# Altium PCB LED_Control.PcbDoc (part 1 of 3)
Units mil, origin at the board's own origin, x right, y up, seen from the top; angles counter-clockwise.
Board outline 2900 x 5000 mil, 4 copper layers (Top Layer, GND1, GND2, Bottom Layer), stack 51.864 mil thick; 163 components, 141 nets, 650 pads, 368 vias.
Unrouted connection lines stored in the file: 67.
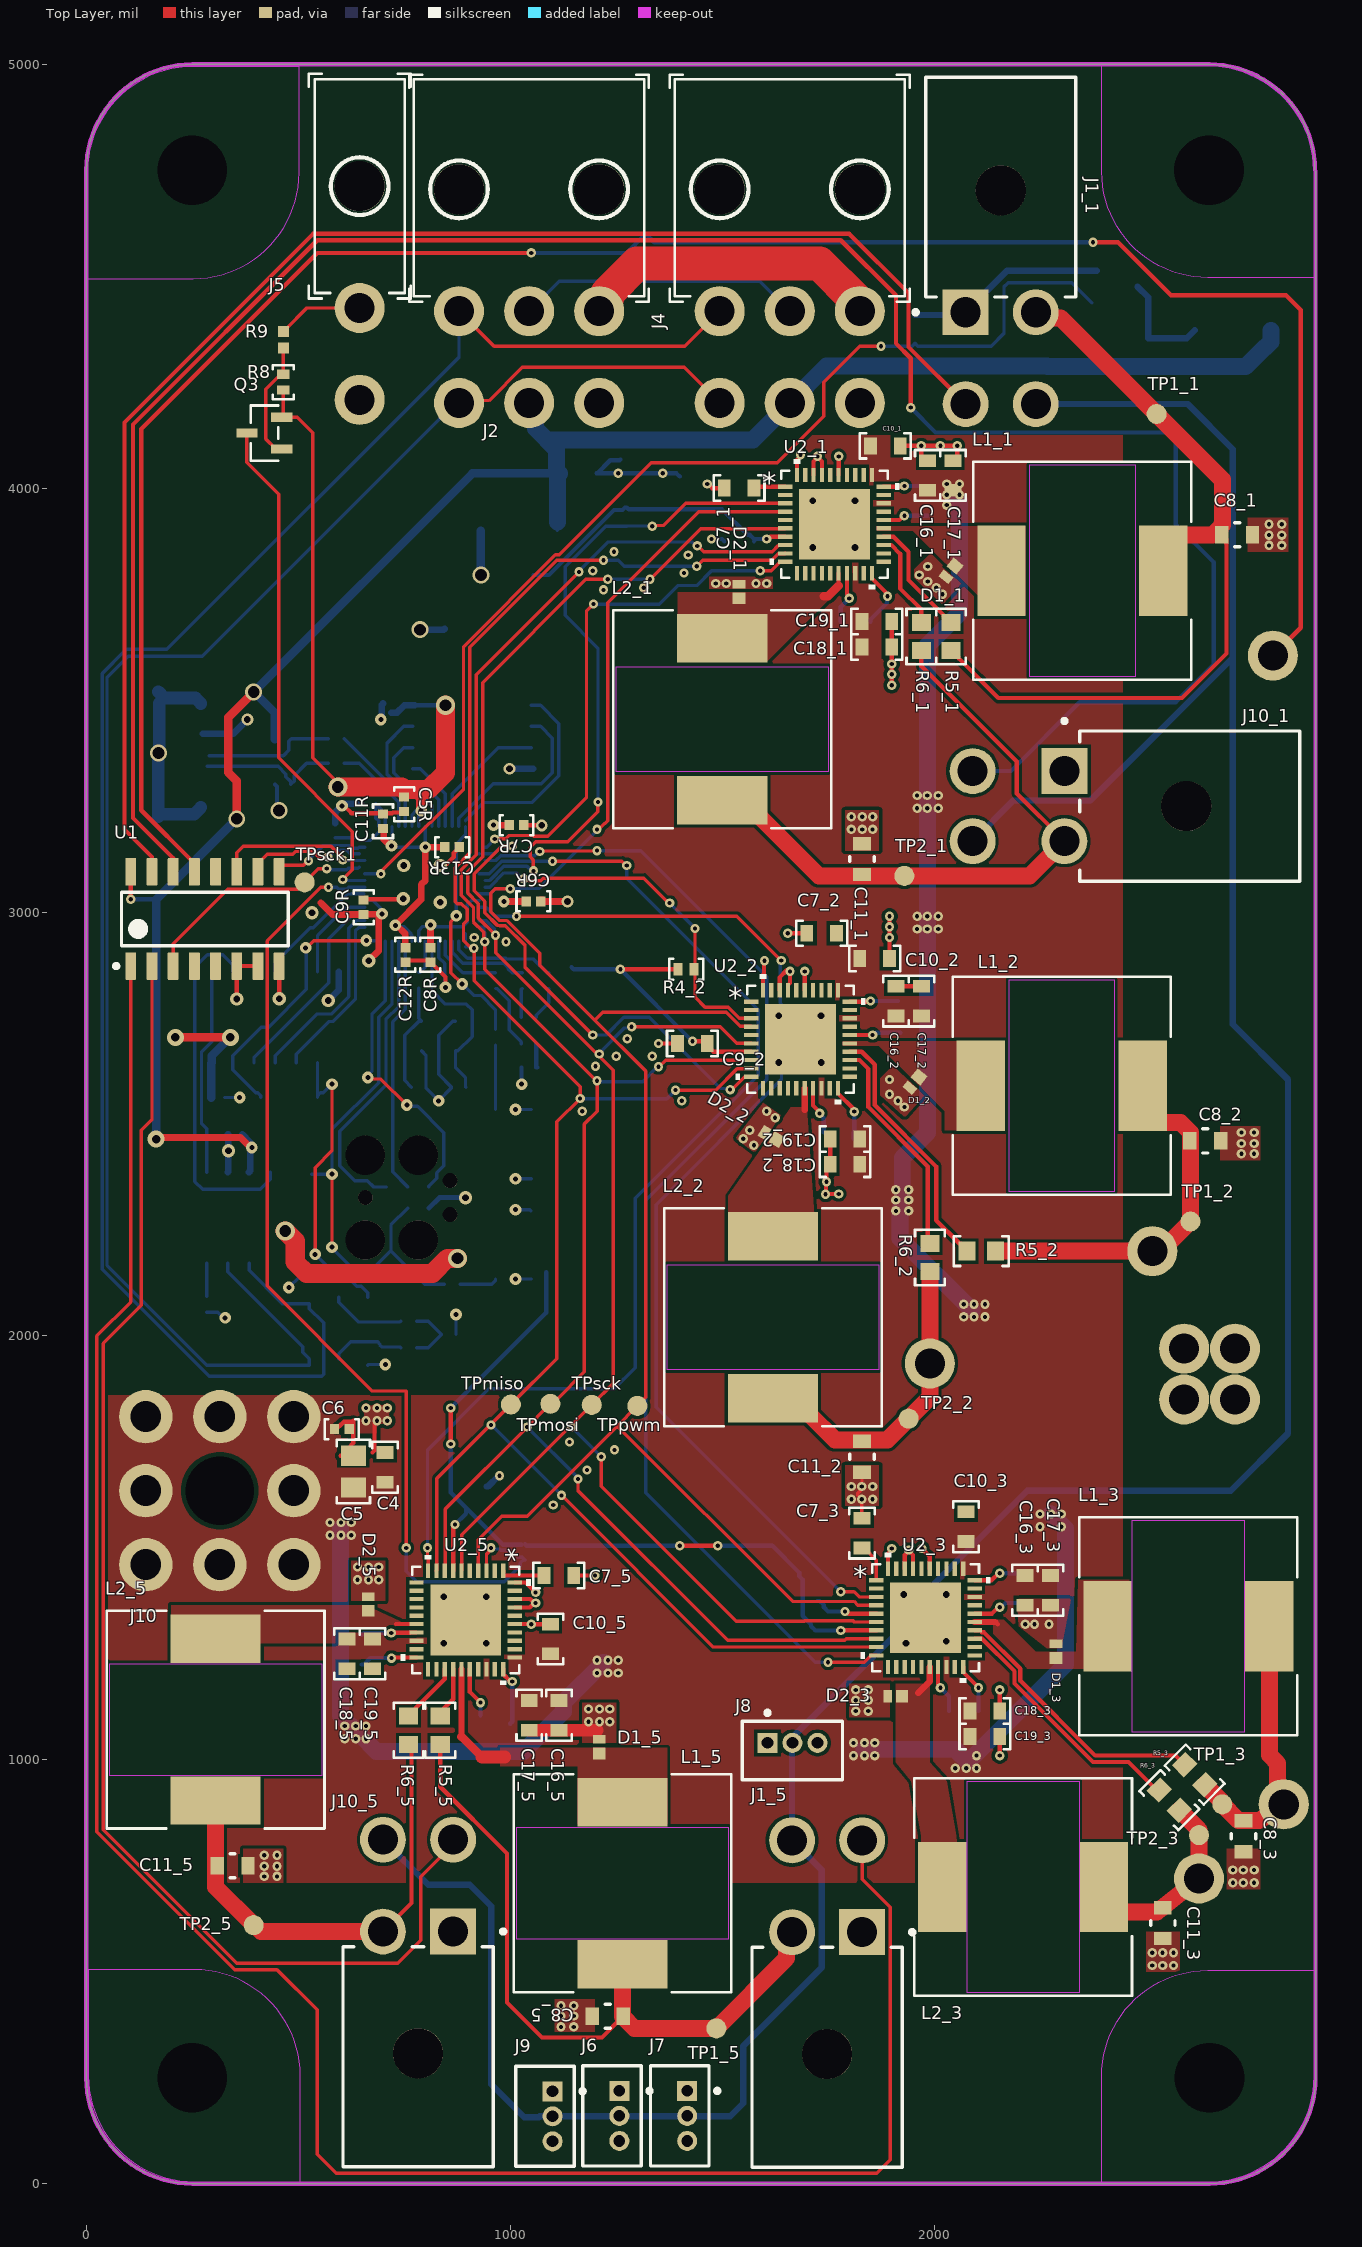
[diagram p0: Top Layer view]
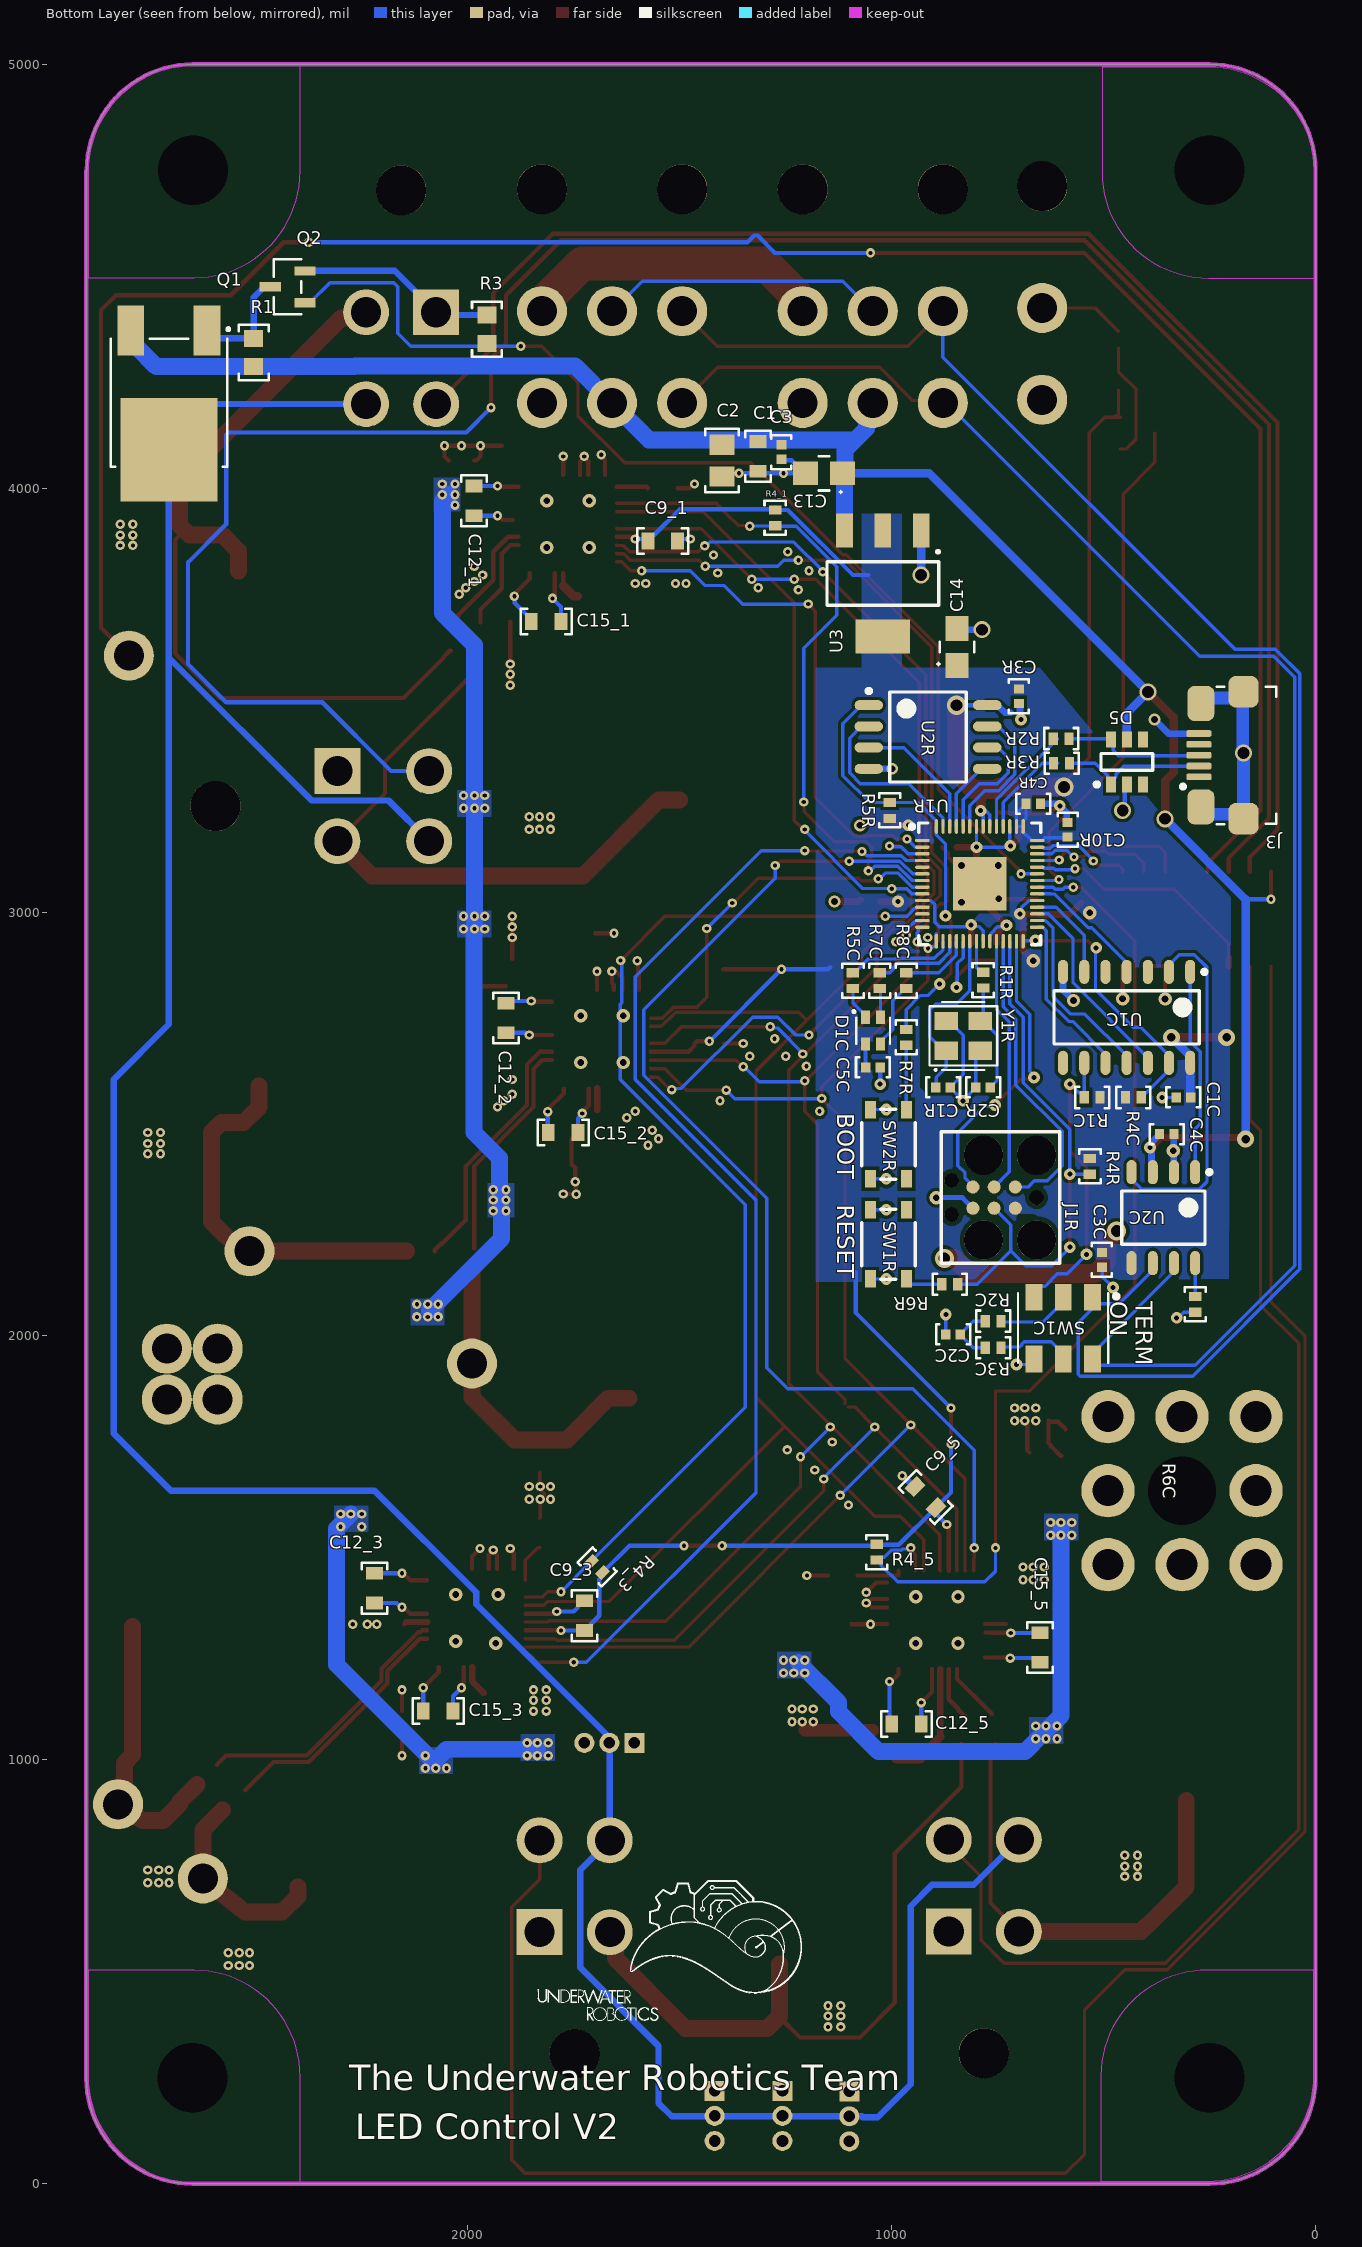
[diagram p1: Bottom Layer view, seen from below]
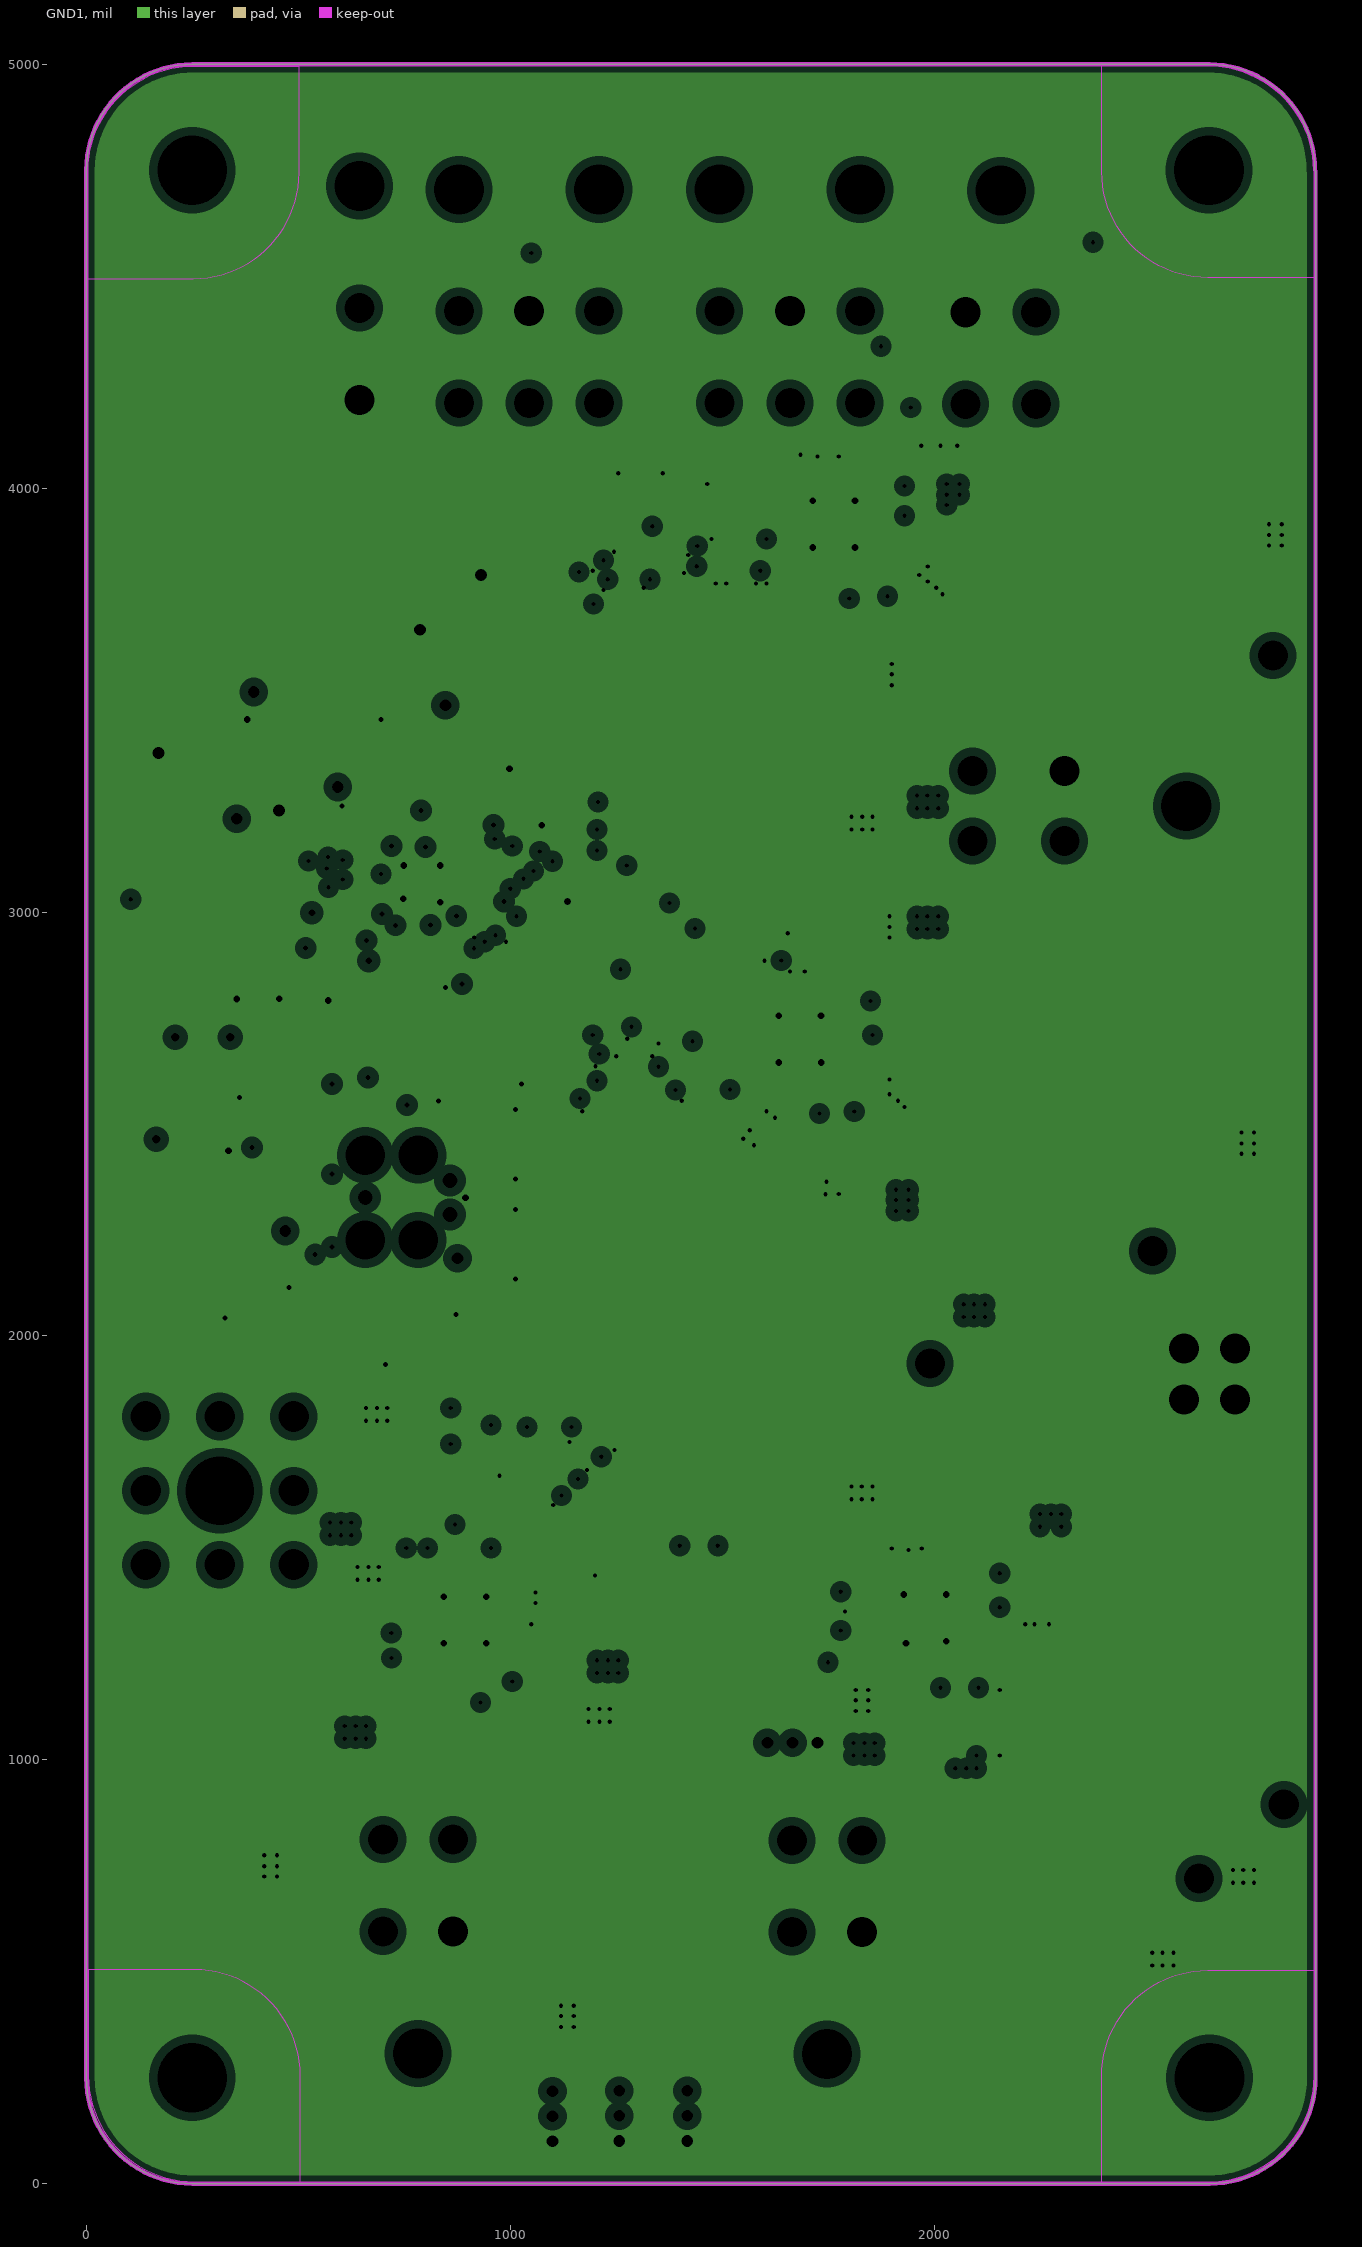
[diagram p2: GND1, clearances drawn from the general rule]
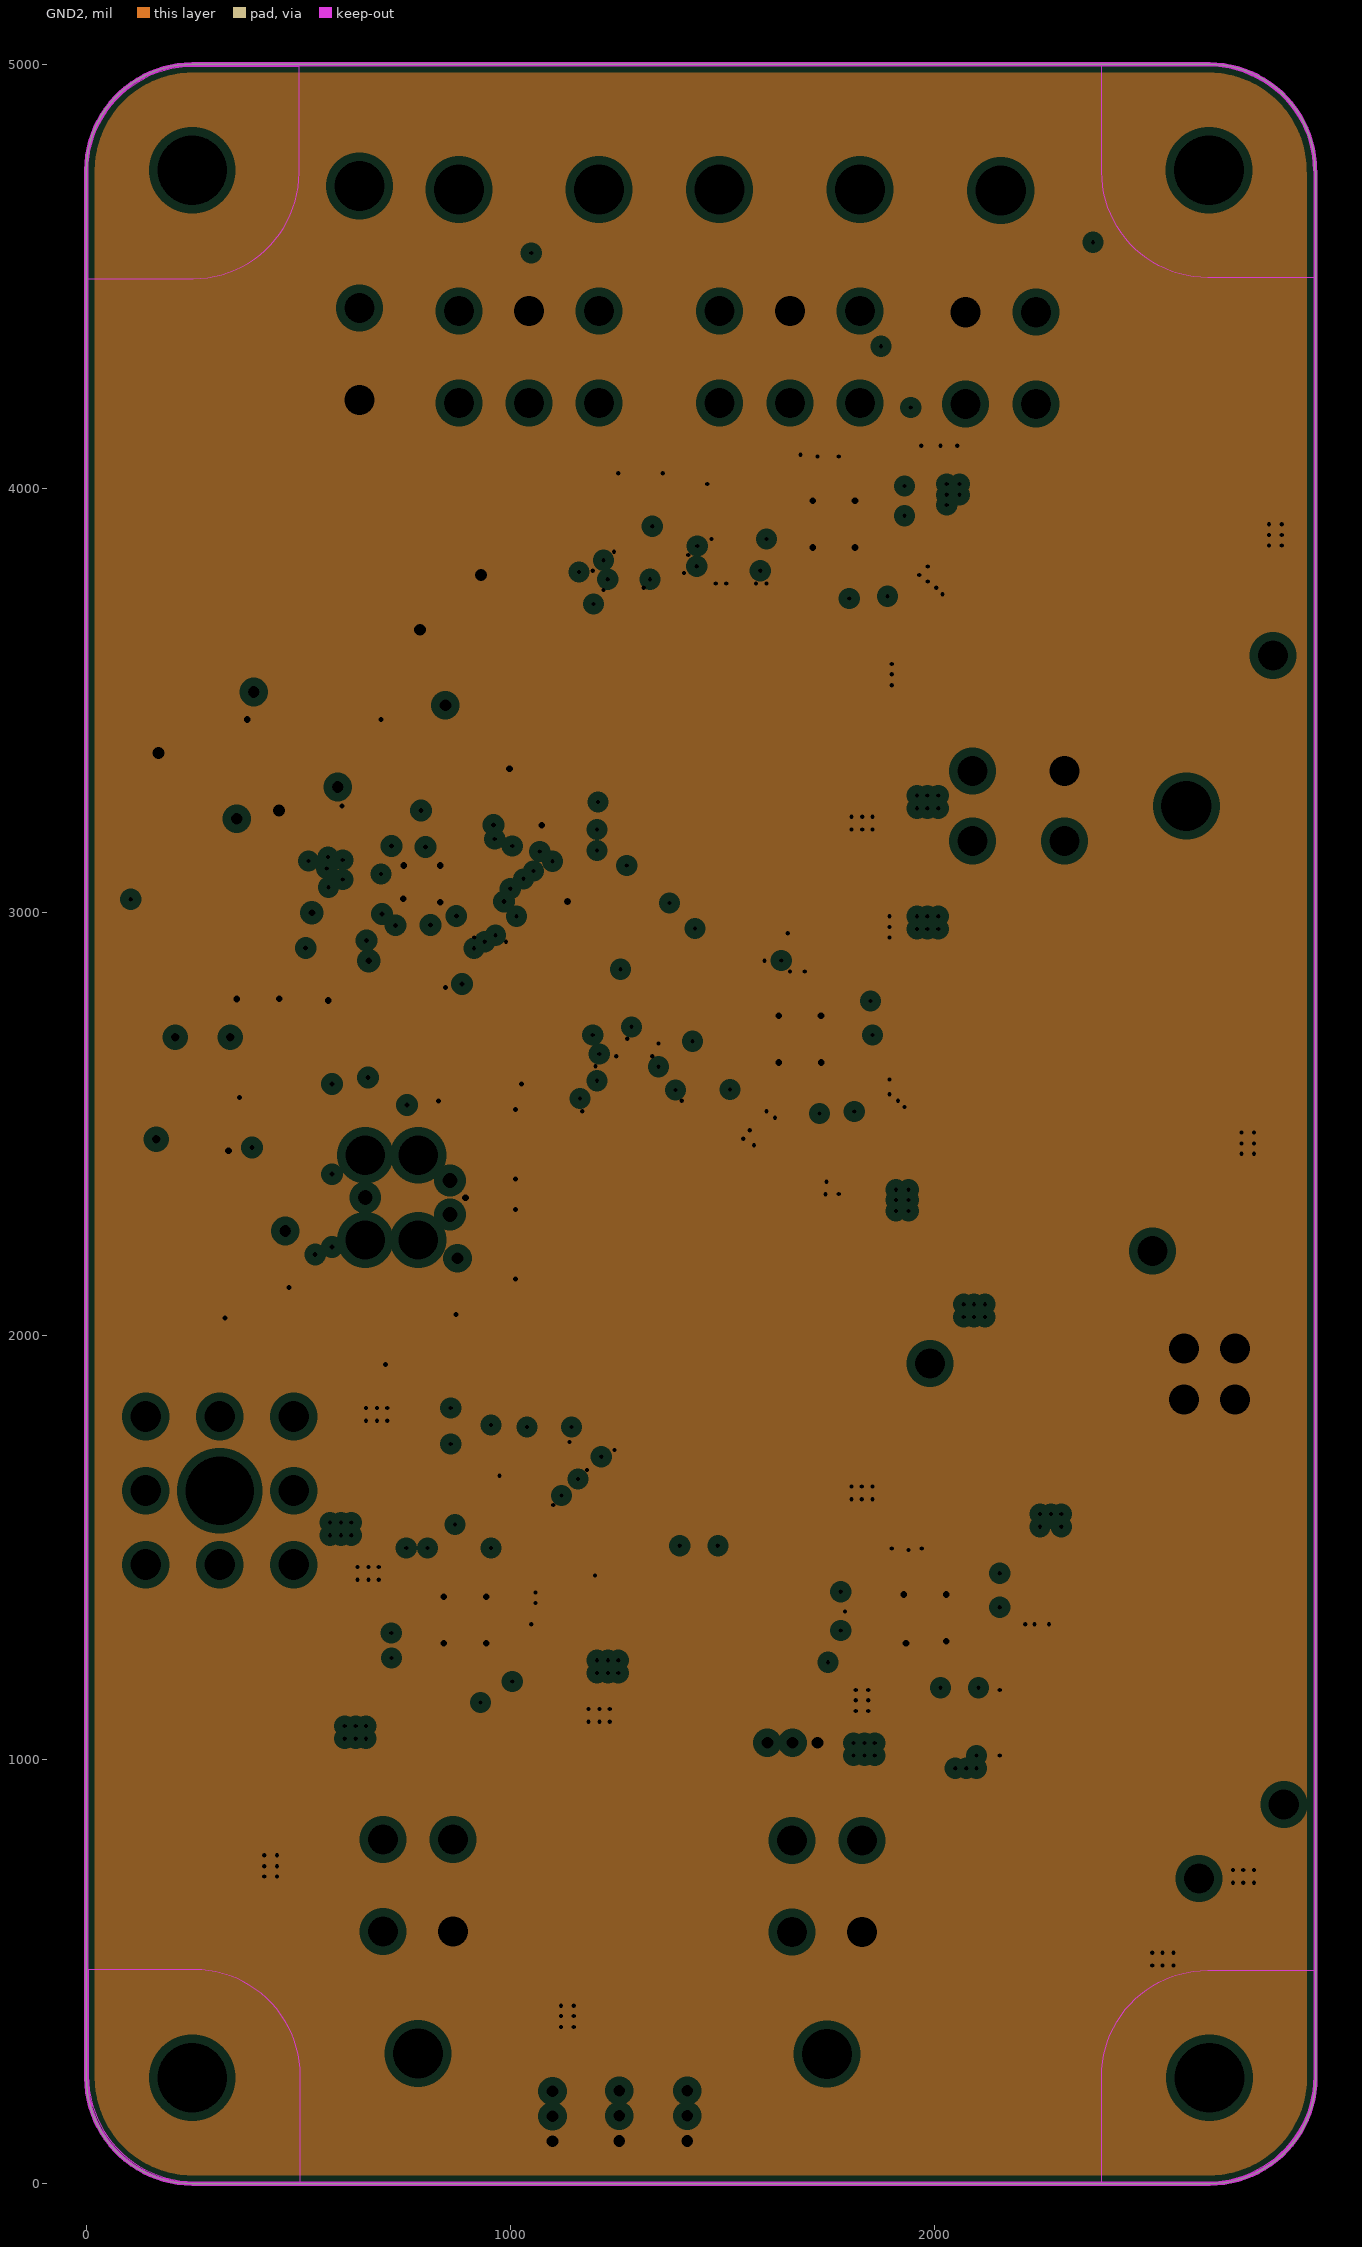
[diagram p3: GND2, clearances drawn from the general rule]
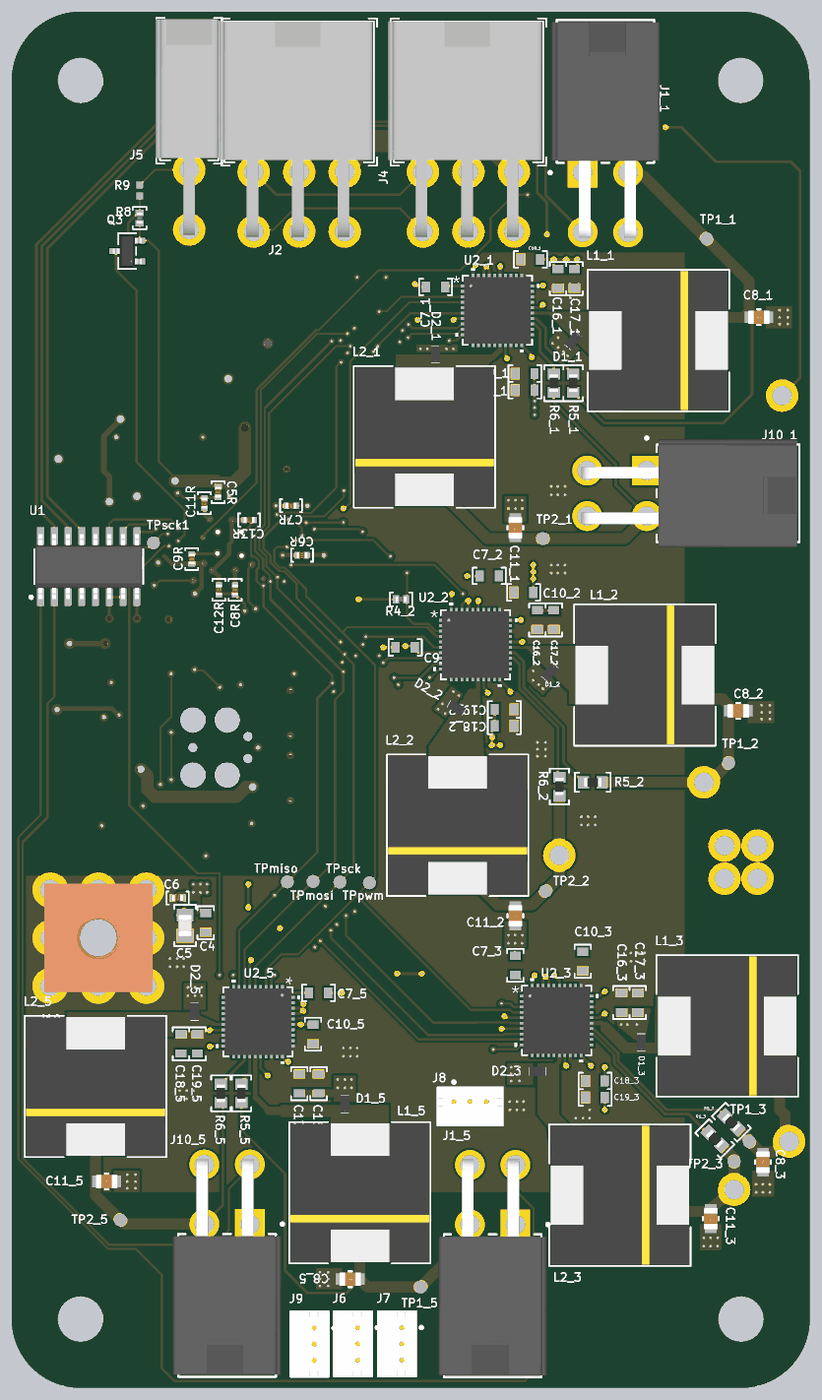
[diagram p5: 3D render of the assembled board from above, using the file's embedded part models]
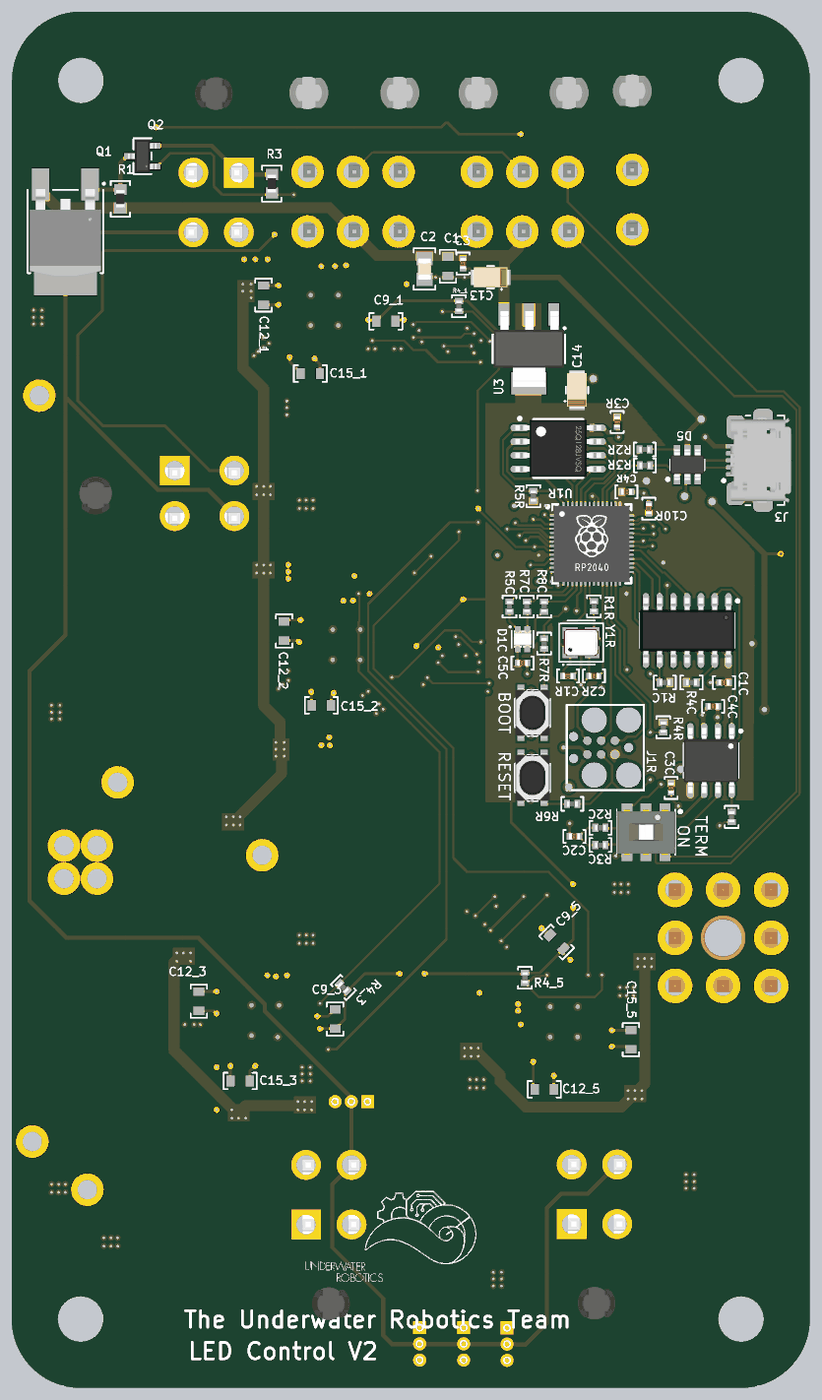
[diagram p6: 3D render of the assembled board from below, using the file's embedded part models]

## Layer stack, top to bottom
Top Solder: solder mask 1, SM-001, Dk 4
Top Layer: signal copper 1.378
Dielectric 1: prepreg 5.1, PP-017, Dk 4.3
Dielectric 2: prepreg 5.1, PP-017, Dk 4.3
GND1: plane copper 0.3539, net GND_RP2CAN
Dielectric 3: core 28, Core-039, Dk 4.8
GND2: plane copper 0.3539, net GND_RP2CAN
Dielectric 4: prepreg 5.1, PP-017, Dk 4.3
Dielectric 5: prepreg 5.1, PP-017, Dk 4.3
Bottom Layer: signal copper 1.378
Bottom Solder: solder mask 1, SM-001, Dk 4

## Board outline
0,250 0,4750 cw(c250,4750) 250,5000 2648.66,5000 cw(c2648.66,4750) 2898.66,4750 2900,4748.03 2900,250 2899.88,250 cw(c2649.88,250) 2649.88,0 250,0 cw(c250,250)

## Design rules (kind name [scope] priority, off if disabled: settings)
AcuteAngle [All] p1: minimum=6.00000000000000E+0001 checktracksonly=FALSE
BoardOutlineClearance "BoardOutlineClearance JLCPCB" [All] p1: gap=7.87 ignorepadtopadclearanceinfootprint=FALSE
Clearance "Clearance JLCPCB 4 layer" [All] p1: gap=7.87 ignorepadtopadclearanceinfootprint=FALSE except(3.54: Arc-Arc Arc-Track Track-Track; 5: Arc-SMDPad Track-SMDPad SMDPad-SMDPad; 10: Arc-Hole Track-Hole SMDPad-Hole THPad-Hole Via-Hole Fill-Hole Poly-Hole Region-Hole Text-Hole)
DiffPairsRouting [All] p1: maxlimit=10 minlimit=6 mostfreqgap=8 toplayer_minwidth=3.54 toplayer_maxwidth=15 toplayer_prefwidth=8 bottomlayer_minwidth=3.54 bottomlayer_maxwidth=15 bottomlayer_prefwidth=8 maxuncoupledlength=500
HoleSize "HoleSize JLCPCB Pad" [IsPad] p1: absolutevalues=TRUE maxlimit=248.03 minlimit=19.68 maxpercent=80.000 minpercent=20.000
HoleSize "HoleSize JLCPCB 4 layer" [All] p2: absolutevalues=TRUE maxlimit=248.03 minlimit=7.87 maxpercent=80.000 minpercent=20.000
HoleToHoleClearance "HoleToHoleClearance JLCPCB" [All] p1: gap=10 allowstackedmicrovias=TRUE
MinimumAnnularRing "MinimumAnnularRing JLCPCB Pad" [IsPad] p1: minimumring=11.81
MinimumAnnularRing "MinimumAnnularRing JLCPCB 1oz" [All] p2: minimumring=5.12
MinimumSolderMaskSliver [All] p1: minsoldermaskwidth=1
PlaneClearance [All] p1: clearance=20
PlaneConnect [All] p1: pad.planeconnectstyle=Relief pad.reliefexpansion=20 pad.reliefentries=4 pad.reliefconductorwidth=10 pad.reliefairgap=10 via.planeconnectstyle=Direct via.reliefexpansion=20 via.reliefentries=4 via.reliefconductorwidth=10 via.reliefairgap=10
PolygonConnect [All] p1: connectstyle=Direct reliefconductorwidth=15 reliefentries=4 polygonreliefangle="45 Angle" airgapwidth=10
RoutingVias "RoutingVias JLCPCB 4 layer" [All] p1: holewidth=19.68 width=39.37 viastyle="Through Hole" minholewidth=7.87 minwidth=15.75 maxholewidth=50 maxwidth=80
SilkToSilkClearance [All] p1: silktosilkclearance=3
SilkToSolderMaskClearance "SilkToSolderMaskClearance JLCPCB" [IsPad] p1: minsilkscreentomaskgap=5.91 clearancetoexposedcopper=TRUE
SolderMaskExpansion "SolderMaskExpansion JLCPCB" [All] p1: expansion=1.97 istentingtop=FALSE
Width "Width JLCPCB 4 layer" [All] p1: maxlimit=196.85 minlimit=3.54 preferedwidth=9.84 minimp=50.000000 maximp=50.000000 favimp=50.000000
22 further rules are at their usual default settings.

## Classes and differential pairs
channel class LED_Controller: Module1 Module2 Module3 Module4 Module5
net class Temp2[7..4]: Temp24 Temp25 Temp26 Temp27
net class Temp1[3..0]: Temp10 Temp11 Temp12 Temp13
net class DIN[4..0]: DIN0 DIN1 DIN2 DIN3 DIN4
net class CSN[4..0]: CSN0 CSN1 CSN2 CSN3 CSN4
component class Module5: C7_5 C8_5 C9_5 C10_5 C11_5 C12_5 C15_5 C16_5 C17_5 C18_5 C19_5 D1_5 D2_5 J1_5 J10_5 L1_5 L2_5 R4_5 R5_5 R6_5 TP1_5 TP2_5 U2_5
component class Module3: C7_3 C8_3 C9_3 C10_3 C11_3 C12_3 C15_3 C16_3 C17_3 C18_3 C19_3 D1_3 D2_3 L1_3 L2_3 R4_3 R5_3 R6_3 TP1_3 U2_3
component class Module2: C7_2 C8_2 C9_2 C10_2 C11_2 C12_2 C15_2 C16_2 C17_2 C18_2 C19_2 D1_2 D2_2 L1_2 L2_2 R4_2 R5_2 R6_2 TP1_2 TP2_2 U2_2
component class Module1: C7_1 C8_1 C9_1 C10_1 C11_1 C12_1 C15_1 C16_1 C17_1 C18_1 C19_1 D1_1 D2_1 J1_1 J10_1 L1_1 L2_1 R4_1 R5_1 R6_1 TP1_1 TP2_1 U2_1
component class Control: C13 C14 D5 J3 Q1 Q2 Q3 R1 R3 R8 R9 TPmosi TPpwm TPsck TPsck1 U1 U3
component class Connectors: C1 C2 C3 C4 C5 C6 J2 J4 J5 J6 J7 J8 J9
differential pair class "USB 2.0": USB USB_RP2040
component class U_RP2040_with_CAN: C1C C2C C3C C4C C5C D1C R1C R2C R3C R4C R5C R6C R7C R8C SW1C U1C U2C
component class U_RP2040_C: C1R C2R C3R C4R C5R C6R C7R C8R C9R C10R C11R C12R C13R J1R R1R R2R R3R R4R R5R R6R R7R SW1R SW2R U1R U2R Y1R
differential pair USB: +USB_P -USB_N
differential pair USB_RP2040: +USB_RP2040_P -USB_RP2040_N

## Components (designator, comment, footprint, x,y, rotation, side; value= is the part's Value field where it differs from the comment)
C1 "1uF Ceramic 16V" CAPACITOR_0603 1315,4075 r270 bottom value=1uF
C1C "100nF Ceramic 25V" CAPACITOR_0402 311.81,2562.6 r0 bottom value=0.1uF
C1R "27pF Ceramic 50V" CAPACITOR_0402 878.74,2586.22 r180 bottom value=27pF
C2 "100nF Ceramic 50V" CAPACITOR_0805 1400,4065 r270 bottom value=0.1uF
C2C "4700pF Ceramic 25V" CAPACITOR_0402 855.12,2003.54 r180 bottom value=4.7nF
C2R "27pF Ceramic 50V" CAPACITOR_0402 784.25,2586.22 r0 bottom value=27pF
C3 "22nF Ceramic 25V" CAPACITOR_0402 1260,4085 r270 bottom value=22nF
C3C "100nF Ceramic 25V" CAPACITOR_0402 503.94,2179.57 r270 bottom value=0.1uF
C3R "100nF Ceramic 6.3V" CAPACITOR_0402 700,3509.2 r270 bottom value=0.1uF
C4 "1uF Ceramic 16V" CAPACITOR_0603 705,1690 r90 top value=1uF
C4C "100nF Ceramic 25V" CAPACITOR_0402 351.18,2475.99 r180 bottom value=0.1uF
C4R "1uF Ceramic 16V" CAPACITOR_0402 666.14,3255.51 r180 bottom value=1uF
C5 "100nF Ceramic 50V" CAPACITOR_0805 630,1680 r90 top value=0.1uF
C5C "1uF Ceramic 16V" CAPACITOR_0402 1044.09,2633.47 r180 bottom value=1uF
C5R "100nF Ceramic 6.3V" CAPACITOR_0402 750,3254.2 r270 top value=0.1uF
C6 "22nF Ceramic 25V" CAPACITOR_0402 602.87,1780 r0 top value=22nF
C6R "100nF Ceramic 6.3V" CAPACITOR_0402 1055,3025 r0 top value=0.1uF
C7_1 "4.7uF Ceramic 6.3V" CAPACITOR_0603 1540,4000 r0 top value=4.7uF (schematic designator C7)
C7_2 "4.7uF Ceramic 6.3V" CAPACITOR_0603 1735,2950 r0 top value=4.7uF (schematic designator C7)
C7_3 "4.7uF Ceramic 6.3V" CAPACITOR_0603 1830,1535 r270 top value=4.7uF (schematic designator C7)
C7_5 "4.7uF Ceramic 6.3V" CAPACITOR_0603 1115,1435 r180 top value=4.7uF (schematic designator C7)
C7R "100nF Ceramic 6.3V" CAPACITOR_0402 1015,3205 r0 top value=0.1uF
C8_1 "22uF" FP-C2012-125-0_2-MFG 2715,3890 r0 top (schematic designator C8)
C8_2 "22uF" FP-C2012-125-0_2-MFG 2640,2460 r0 top (schematic designator C8)
C8_3 "22uF" FP-C2012-125-0_2-MFG 2730,820 r270 top (schematic designator C8)
C8_5 "22uF" FP-C2012-125-0_2-MFG 1230,395 r180 top (schematic designator C8)
C8R "100nF Ceramic 6.3V" CAPACITOR_0402 811.92,2899.06 r270 top value=0.1uF
C9_1 "100nF Ceramic 6.3V" CAPACITOR_0603 1540,3875 r180 bottom value=0.1uF (schematic designator C9)
C9_2 "100nF Ceramic 6.3V" CAPACITOR_0603 1430,2690 r180 top value=0.1uF (schematic designator C9)
C9_3 "100nF Ceramic 6.3V" CAPACITOR_0603 1725,1340 r90 bottom value=0.1uF (schematic designator C9)
C9_5 "100nF Ceramic 6.3V" CAPACITOR_0603 920,1620 r45 bottom value=0.1uF (schematic designator C9)
C9R "100nF Ceramic 6.3V" CAPACITOR_0402 654.33,3011.42 r90 top value=0.1uF
C10_1 "4.7uF" CAPACITOR_0603 1885,4100 r0 top (schematic designator C10)
C10_2 "4.7uF" CAPACITOR_0603 1860,2890 r0 top (schematic designator C10)
C10_3 "4.7uF" CAPACITOR_0603 2075,1550 r90 top (schematic designator C10)
C10_5 "4.7uF" CAPACITOR_0603 1095,1285 r90 top (schematic designator C10)
C10R "100nF Ceramic 6.3V" CAPACITOR_0402 585,3194.2 r90 bottom value=0.1uF
C11_1 "22uF" FP-C2012-125-0_2-MFG 1830,3125 r90 top (schematic designator C11)
C11_2 "22uF" FP-C2012-125-0_2-MFG 1830,1715 r270 top (schematic designator C11)
C11_3 "22uF" FP-C2012-125-0_2-MFG 2540,615 r270 top (schematic designator C11)
C11_5 "22uF" FP-C2012-125-0_2-MFG 345,750 r0 top (schematic designator C11)
C11R "1uF Ceramic 16V" CAPACITOR_0402 700,3214.2 r90 top value=1uF
C12_1 "100nF Ceramic 25V" CAPACITOR_0603 1985,3970 r270 bottom value=0.1uF (schematic designator C12)
C12_2 "100nF Ceramic 25V" CAPACITOR_0603 1910,2750 r270 bottom value=0.1uF (schematic designator C12)
C12_3 "100nF Ceramic 25V" CAPACITOR_0603 2220,1405 r270 bottom value=0.1uF (schematic designator C12)
C12_5 "100nF Ceramic 25V" CAPACITOR_0603 965,1085 r180 bottom value=0.1uF (schematic designator C12)
C12R "100nF Ceramic 6.3V" CAPACITOR_0402 752.76,2899.06 r270 top value=0.1uF
C13 "10uF Tantalum 16V" "CAPACITOR_1206 - POLAR" 1160,4035 r0 bottom
C13R "100nF Ceramic 6.3V" CAPACITOR_0402 862.99,3153.15 r0 top value=0.1uF
C14 "10uF Tantalum 16V" "CAPACITOR_1206 - POLAR" 845.8,3625 r90 bottom
C15_1 "100nF Ceramic 25V" CAPACITOR_0603 1815,3685 r0 bottom value=0.1uF (schematic designator C15)
C15_2 "100nF Ceramic 25V" CAPACITOR_0603 1775,2480 r0 bottom value=0.1uF (schematic designator C15)
C15_3 "100nF Ceramic 25V" CAPACITOR_0603 2070,1115 r0 bottom value=0.1uF (schematic designator C15)
C15_5 "100nF Ceramic 25V" CAPACITOR_0603 650,1265 r270 bottom value=0.1uF (schematic designator C15)
C16_1 "1uF Ceramic 25V" CAPACITOR_0603 1985,4030 r270 top value=1uF (schematic designator C16)
C16_2 "1uF Ceramic 25V" CAPACITOR_0603 1910,2790 r270 top value=1uF (schematic designator C16)
C16_3 "1uF Ceramic 25V" CAPACITOR_0603 2215,1400 r90 top value=1uF (schematic designator C16)
C16_5 "1uF Ceramic 25V" CAPACITOR_0603 1115,1105 r90 top value=1uF (schematic designator C16)
C17_1 "100nF Ceramic 25V" CAPACITOR_0603 2045,4030 r90 top value=0.1uF (schematic designator C17)
C17_2 "100nF Ceramic 25V" CAPACITOR_0603 1970,2790 r90 top value=0.1uF (schematic designator C17)
C17_3 "100nF Ceramic 25V" CAPACITOR_0603 2275,1400 r270 top value=0.1uF (schematic designator C17)
C17_5 "100nF Ceramic 25V" CAPACITOR_0603 1045,1105 r270 top value=0.1uF (schematic designator C17)
C18_1 "1uF Ceramic 25V" CAPACITOR_0603 1865,3625 r180 top value=1uF (schematic designator C18)
C18_2 "1uF Ceramic 25V" CAPACITOR_0603 1790,2405 r0 top value=1uF (schematic designator C18)
C18_3 "1uF Ceramic 25V" CAPACITOR_0603 2120,1115 r180 top value=1uF (schematic designator C18)
C18_5 "1uF Ceramic 25V" CAPACITOR_0603 615,1250 r90 top value=1uF (schematic designator C18)
C19_1 "100nF Ceramic 25V" CAPACITOR_0603 1865,3685 r0 top value=0.1uF (schematic designator C19)
C19_2 "100nF Ceramic 25V" CAPACITOR_0603 1790,2465 r180 top value=0.1uF (schematic designator C19)
C19_3 "100nF Ceramic 25V" CAPACITOR_0603 2120,1055 r0 top value=0.1uF (schematic designator C19)
C19_5 "100nF Ceramic 25V" CAPACITOR_0603 675,1250 r270 top value=0.1uF (schematic designator C19)
D1_1 "CCS15S40,L3F" "SOD-963   CST2C_TOS" 2040,3805 r230 top (schematic designator D1)
D1_2 "CCS15S40,L3F" "SOD-963   CST2C_TOS" 1955,2600 r230 top (schematic designator D1)
D1_3 "CCS15S40,L3F" "SOD-963   CST2C_TOS" 2287.64,1255 r90 top (schematic designator D1)
D1_5 "CCS15S40,L3F" "SOD-963   CST2C_TOS" 1210,1030 r90 top (schematic designator D1)
D1C "EAST1616RGBB4" LED_0606_4SMD 1044.09,2720.08 r270 bottom
D2_1 "CCS15S40,L3F" "SOD-963   CST2C_TOS" 1540,3755 r90 top (schematic designator D2)
D2_2 "CCS15S40,L3F" "SOD-963   CST2C_TOS" 1616.2,2470.65 r150 top (schematic designator D2)
D2_3 "CCS15S40,L3F" "SOD-963   CST2C_TOS" 1910,1150 r180 top (schematic designator D2)
D2_5 "CCS15S40,L3F" "SOD-963   CST2C_TOS" 665,1366.3 r90 top (schematic designator D2)
D5 "TVS DIODE 5VWM 25VC SOT23-6" "SOT 23-6L" 445,3354.2 r90 bottom
J1_1 "172448-0004" FP-172448-0004-MFG 2157.32,4710.28 r180 top (schematic designator J1)
J1_5 "172448-0004" FP-172448-0004-MFG 1747.68,298.19 r0 top (schematic designator J1)
J1R "TagConnect SWD" TC2030-MCP 658.27,2326.38 r0 bottom
J2 "Mini-Fit Jr R/A" "CONN_MOLEX_MINIFIT JR_6 POS_R/A" 1210,4705 r180 top
J3 "USB_MICRO R/A" CONN_MINIUSB 170,3370 r90 bottom
J4 "Mini-Fit Jr R/A" "CONN_MOLEX_MINIFIT JR_6 POS_R/A" 1825,4705 r180 top
J5 "Mini-Fit Jr R/A" "CONN_MOLEX_MINIFIT JR_2 POS_R/A" 645,4712.4 r180 top
J6 "B3B-ZR(LF)(SN)" FP-B3B-ZR_LF_SN-MFG 1240,160 r90 top
J7 "B3B-ZR(LF)(SN)" FP-B3B-ZR_LF_SN-MFG 1400,160 r90 top
J8 "B3B-ZR(LF)(SN)" FP-B3B-ZR_LF_SN-MFG 1665.94,1022.28 r180 top
J9 "B3B-ZR(LF)(SN)" FP-B3B-ZR_LF_SN-MFG 1082.28,159.06 r90 top
J10 "Redcube M4 Term 85A" "Redcube M4 Term 85A" 315,1635 r0 top locked (schematic designator J3)
J10_1 "172448-0004" FP-172448-0004-MFG 2602.87,3250 r90 top (schematic designator J10)
J10_5 "172448-0004" FP-172448-0004-MFG 782.68,299.72 r0 top (schematic designator J10)
L1_1 "SRR1280-221K" IND_BOURNS_SRR1280 2350,3805 r180 top (schematic designator L1)
L1_2 "SRR1280-221K" IND_BOURNS_SRR1280 2301,2590 r180 top (schematic designator L1)
L1_3 "SRR1280-221K" IND_BOURNS_SRR1280 2600,1315 r180 top (schematic designator L1)
L1_5 "SRR1280-221K" IND_BOURNS_SRR1280 1265,709 r90 top (schematic designator L1)
L2_1 "SRR1280-221K" IND_BOURNS_SRR1280 1500,3455 r90 top (schematic designator L2)
L2_2 "SRR1280-221K" IND_BOURNS_SRR1280 1620,2044 r90 top (schematic designator L2)
L2_3 "SRR1280-221K" IND_BOURNS_SRR1280 2210,700 r180 top (schematic designator L2)
L2_5 "SRR1280-221K" IND_BOURNS_SRR1280 305,1095 r90 top (schematic designator L2)
Q1 "FDD4141" DPAK_ONS 2705,4200 r0 bottom
Q2 "PMV13XNEAR" SOT-23-3 2425,4475 r90 bottom
Q3 "MOSFET P-CHANNEL 20V 4.7A SOT23" SOT-23-3 420,4130 r90 top
R1 "1k Ohm 5% 1/8W" RESISTOR_0603 2505,4320 r90 bottom
R1C "10k Ohm 1% 1/16W" RESISTOR_0402 526.97,2562.6 r0 bottom
R1R "1k Ohm 1% 1/16W" RESISTOR_0402 784.25,2839.25 r270 bottom
R2C "60.4 Ohm 1% 1/16W" RESISTOR_0402 760.63,2035.04 r0 bottom
R2R "27 Ohm 1% 1/16W" RESISTOR_0402 600,3409.2 r0 bottom
R3 "1k Ohm 5% 1/8W" RESISTOR_0603 1955,4375 r90 bottom
R3C "60.4 Ohm 1% 1/16W" RESISTOR_0402 760.63,1972.05 r0 bottom
R3R "27 Ohm 1% 1/16W" RESISTOR_0402 599.15,3351.2 r0 bottom
R4_1 "10k Ohm 1% 1/16W" RESISTOR_0402 1275,3930 r270 bottom (schematic designator R4)
R4_2 "10k Ohm 1% 1/16W" RESISTOR_0402 1415,2865 r0 top (schematic designator R4)
R4_3 "10k Ohm 1% 1/16W" RESISTOR_0402 1695,1455 r45 bottom (schematic designator R4)
R4_5 "10k Ohm 1% 1/16W" RESISTOR_0402 1035,1490 r270 bottom (schematic designator R4)
R4C "10k Ohm 1% 1/16W" RESISTOR_0402 429.92,2562.6 r180 bottom
R4R "10k Ohm 1% 1/16W" RESISTOR_0402 532.28,2400.2 r270 bottom
R5_1 "27 Ohm 5% 1/8W" RESISTOR_0603 2040,3650 r90 top (schematic designator R5)
R5_2 "27 Ohm 5% 1/8W" RESISTOR_0603 2111.5,2200 r180 top (schematic designator R5)
R5_3 "27 Ohm 5% 1/8W" RESISTOR_0603 2615,965 r135 top (schematic designator R5)
R5_5 "27 Ohm 5% 1/8W" RESISTOR_0603 835,1070 r90 top (schematic designator R5)
R5C "604 Ohm 1% 1/16W" RESISTOR_0402 1091.34,2838.19 r270 bottom
R5R "10k Ohm 1% 1/16W" RESISTOR_0402 1004.72,3239.77 r90 bottom
R6_1 "27 Ohm 5% 1/8W" RESISTOR_0603 1970,3650 r90 top (schematic designator R6)
R6_2 "27 Ohm 5% 1/8W" RESISTOR_0603 1990,2185 r90 top (schematic designator R6)
R6_3 "27 Ohm 5% 1/8W" RESISTOR_0603 2555,905 r135 top (schematic designator R6)
R6_5 "27 Ohm 5% 1/8W" RESISTOR_0603 760,1070 r90 top (schematic designator R6)
R6C "10k Ohm 1% 1/16W" RESISTOR_0402 284.06,2074.41 r270 bottom
R6R "1k Ohm 1% 1/16W" RESISTOR_0402 862.99,2121.65 r180 bottom
R7C "200 Ohm 1% 1/16W" RESISTOR_0402 1028.35,2838.19 r270 bottom
R7R "1k Ohm 1% 1/16W" RESISTOR_0402 965.35,2704.33 r90 bottom
R8 "1k Ohm 1% 1/16W" RESISTOR_0402 465,4250 r90 top
R8C "200 Ohm 1% 1/16W" RESISTOR_0402 965.35,2838.19 r270 bottom
R9 "27K" RESC1005X40X25ML05T05 465,4350 r270 top
SW1C "Switch DPDT" CAS-220TA 595.28,2018.54 r0 bottom
SW1R "434123025826" SMD_434123025826 1007.68,2216.14 r270 bottom
SW2R "434123025826" SMD_434123025826 1007.68,2452.36 r270 bottom
TP1_1 "PCB Test Point" TESTPOINT_1.2MM 2525,4175 r90 top (schematic designator TP1)
TP1_2 "PCB Test Point" TESTPOINT_1.2MM 2605,2270 r90 top (schematic designator TP1)
TP1_3 "PCB Test Point" TESTPOINT_1.2MM 2680,895 r90 top (schematic designator TP1)
TP1_5 "PCB Test Point" TESTPOINT_1.2MM 1486.42,366.42 r90 top (schematic designator TP1)
TP2_1 "PCB Test Point" TESTPOINT_1.2MM 1930,3085.31 r90 top (schematic designator TP2)
TP2_2 "PCB Test Point" TESTPOINT_1.2MM 1940,1805 r90 top (schematic designator TP2)
TP2_3 "PCB Test Point" TESTPOINT_1.2MM 2625,822.5 r90 top (schematic designator TP2)
TP2_5 "PCB Test Point" TESTPOINT_1.2MM 395,610 r90 top (schematic designator TP2)
TPmiso "PCB Test Point" TESTPOINT_1.2MM 1001.71,1838.29 r90 top
TPmosi "PCB Test Point" TESTPOINT_1.2MM 1095,1840 r90 top
TPpwm "PCB Test Point" TESTPOINT_1.2MM 1300,1835 r90 top
TPsck "PCB Test Point" TESTPOINT_1.2MM 1192.5,1837.5 r90 top
TPsck1 "PCB Test Point" TESTPOINT_1.2MM 515,3070 r90 top
U1 "CD74HC4051M96" D0016A_M 280,2983.78 r90 top
U1C "MCP2517FD" SOIC-14 445.67,2751.58 r270 bottom
U1R "RP2040" "QFN-56 RP2040" 792.13,3066.54 r180 bottom locked
U2_1 "L99LD20Q6TR" L99LD20Q6TR 1765,3915 r0 top (schematic designator U2)
U2_2 "L99LD20Q6TR" L99LD20Q6TR 1685,2700 r0 top (schematic designator U2)
U2_3 "L99LD20Q6TR" L99LD20Q6TR 1980,1335 r0 top (schematic designator U2)
U2_5 "L99LD20Q6TR" L99LD20Q6TR 895,1330 r270 top (schematic designator U2)
U2C "CAN Transceiver" SOIC-8 359.06,2279.14 r270 bottom
U2R "W25Q128JVSIQ" "SOIC-8 W25QxJV" 914.23,3412.99 r180 bottom
U3 "LM1117IMPX-3.3/NOPB" SOT-223-4 1020.8,3775 r270 bottom
Y1R "CRYSTAL 12.0000MHZ 18PF SMD" "4-SMD, NO LEAD CRYSTAL 3.2x2.5mm" 870.87,2672.84 r180 bottom

## Footprints (in the part's own frame and the unit in brackets; to place one, negate y for a bottom-side part, rotate by r counter-clockwise, add the part's x,y. Pads: shape width x height; smd on the part's side, far side on the other; paste and mask are expansions set on the pad)
"4-SMD, NO LEAD CRYSTAL 3.2x2.5mm" [mm]
  rrect0% 1.4x1.1 smd: 1(0,0) 2(2.032,0) 3(2.032,1.778) 4(0,1.778)
  silkscreen extent -1.02,-1.2 3.05,2.92, body extent -0.58,-0.36 2.62,2.14, height 0.82
CAPACITOR_0402 [mm]
  rect 0.56x0.6 smd: 1(-0.435,0) 2(0.435,0)
  silkscreen extent -1.02,-0.6 1.02,0.6, body extent -0.5,-0.28 0.5,0.27, height 0.51
CAPACITOR_0603 [mil] "CAPACITOR 0603"
  rect 30x40 smd: 1(-35,0) 2(35,0)
  silkscreen extent -60,-30 60,30, body extent -31,-16 31,16, height 31
CAPACITOR_0805 [mm] "CAPACITOR 0805"
  rect 1.2x1.5 smd: 1(-0.95,0) 2(0.95,0)
  silkscreen extent -1.91,-1 1.9,1, body extent -1,-0.62 1,0.63, height 1.26
"CAPACITOR_1206 - POLAR" [mil]
  rect 58.96x55 smd paste+0 mask+0: 1(-43.52,0) 2(43.52,0)
  silkscreen extent -44,-40 12,48, body extent -67,-36 67,36, height 73
CAS-220TA [mm] "SWITCH SLIDE DPDT 100MA 6V"
  rrect0% 1x1.6 smd: 1(-1.75,-1.85) 2(0,-1.85) 3(1.75,-1.85) 4(-1.75,1.85) 5(0,1.85) 6(1.75,1.85)
  silkscreen extent -3.3,-2.1 2.7,2.1, body extent -2.7,-2.1 2.7,2.1, height 2.51
CONN_MINIUSB [mm] "USB2.0 Micro-B Receptacle SMD R/A"
  rrect50% 0.4x1.5 smd: 1(-1.3,2.675) 2(-0.65,2.675) 3(0,2.675) 4(0.65,2.675) 5(1.3,2.675)
  rrect50% 2.1x1.6 smd: 6(-3.1,2.55) 7(3.1,2.55)
  rrect50% 1.9x1.8 smd: 8(3.8,0) 9(-3.8,0)
  silkscreen extent -4.14,-1.96 4.11,3.75, body extent -3.96,-2.67 3.96,2.99, height 2.72
"CONN_MOLEX_MINIFIT JR_2 POS_R/A" [mm] "Molex Minifit Jr 5569 2 Pos R/A"
  round 3 hole 1.8: 1(0,7.3) 2(0,12.8)
  round 3 hole 3 unplated mask+0: ""(0,0)
  silkscreen extent -3.05,-6.73 3.05,6.73, body extent -2.7,-6.6 3.1,13.34, height 11.4
"CONN_MOLEX_MINIFIT JR_6 POS_R/A" [mm] "Molex Minifit Jr 5569 6 Pos R/A"
  round 3 hole 1.801: 1(8.4,7.3) 4(8.4,12.8)
  round 3 hole 1.8: 2(4.2,7.3) 3(0,7.3) 5(4.2,12.8) 6(0,12.8)
  round 3 hole 3 unplated mask+0: ""(0,0) ""(8.4,0)
  silkscreen extent -2.98,-6.86 11.38,6.73, body extent -2.58,-6.6 11.62,13.33, height 11.4
D0016A_M [mm] "SOIC, 16-Leads, Body 10x4mm, Pitch 1.27mm, IPC Low Density"
  rrect15% 1.65x0.65 smd: 1(-2.825,4.445) 2(-2.825,3.175) 3(-2.825,1.905) 4(-2.825,0.635) 5(-2.825,-0.635) 6(-2.825,-1.905) 7(-2.825,-3.175) 8(-2.825,-4.445) 9(2.825,-4.445) 10(2.825,-3.175) 11(2.825,-1.905) 12(2.825,-0.635) 13(2.825,0.635) 14(2.825,1.905) 15(2.825,3.175) 16(2.825,4.445)
  silkscreen extent -2.95,-5 1.6,5.44, body extent -3,-4.95 3,4.95, height 1.59
DPAK_ONS [mil]
  rect 63x118 smd: 1(-90,-172.5) 2(90,-172.5)
  rect 228x244 smd: 3(0,109.5)
  silkscreen extent -142,-177 138,150, body extent -129,-156 129,160, height 94
FP-172448-0004-MFG [mm]
  rect 2.75x2.75 hole 1.8 paste-2539.97 mask+0: 1(2.1,7.5)
  round 2.75 hole 1.8 paste-2539.97 mask+0: 2(-2.1,7.5) 3(2.1,13) 4(-2.1,13)
  round 3 hole 3 unplated paste-2539.97 mask+0: ""(0,0.2)
  silkscreen extent -4.5,-6.59 5.22,7.62, body extent -4.6,-6.69 4.6,14.48, height 0.25
FP-B3B-ZR_LF_SN-MFG [mm]
  rect 1.2x1.2 hole 0.7 paste-2539.97 mask+0: 1(1.5,-0.45)
  round 1.2 hole 0.7 paste-2539.97 mask+0: 2(0,-0.45) 3(-1.5,-0.45)
  silkscreen extent -3,-2.38 3,1.75, body extent -3.1,-1.85 3.1,1.85, height 0.25
FP-C2012-125-0_2-MFG [mm]
  rect 0.8x1.05 smd paste+0 mask+0: 1(-0.925,0) 2(0.925,0)
  silkscreen extent -0.15,-0.72 0.15,0.72, body extent -1.43,-0.82 1.43,0.82, height 0.25
IND_BOURNS_SRR1280 [mil] "220 µH Shielded Drum Core, Wirewound Inductor 1.6 A 400mOhm Max Nonstandard"
  rect 114x213 smd paste+0 mask+0: 1(-191,0) 2(191,0)
  Top Layer keep-out region: -124.13,-250 -124.13,250 124.13,250 124.13,-250
  silkscreen extent -257,-257 257,257, body extent -252,-252 252,252, height 315
L99LD20Q6TR [mil] "IC LED DRVR RGLTR PWM 1.5A 40QFN"
  rect 34x10 smd paste+0 mask+0: 1(-116,88.61) 2(-116,68.92) 3(-116,49.22) 4(-116,29.53) 5(-116,9.84) 6(-116,-9.84) 7(-116,-29.53) 8(-116,-49.22) 9(-116,-68.92) 10(-116,-88.61) 21(116,-88.61) 22(116,-68.92) 23(116,-49.22) 24(116,-29.53) 25(116,-9.84) 26(116,9.84) 27(116,29.53) 28(116,49.22) 29(116,68.92) 30(116,88.61)
  rect 10x34 smd paste+0 mask+0: 11(-88.61,-116) 12(-68.92,-116) 13(-49.22,-116) 14(-29.54,-116) 15(-9.85,-116) 16(9.85,-116) 17(29.54,-116) 18(49.22,-116) 19(68.92,-116) 20(88.61,-116) 31(88.61,116) 32(68.92,116) 33(49.22,116) 34(29.54,116) 35(9.85,116) 36(-9.85,116) 37(-29.54,116) 38(-49.22,116) 39(-68.92,116) 40(-88.61,116)
  rect 167x167 smd paste-83 mask+0: 41(0,0)
  silkscreen extent -153,-153 153,153, body extent -121,-121 121,121, height 41
LED_0606_4SMD [mm]
  rrect0% 0.8x0.55 smd: 1(-0.8,-0.45) 2(-0.8,0.45) 3(0.8,0.45) 4(0.8,-0.45)
  silkscreen extent -1.22,-1.22 0.8,1.02, body extent -0.8,-0.8 0.8,0.8, height 0.35
"QFN-56 RP2040" [mm] "QFN, 56-Leads, Body 7.00x7.00mm, Pitch 0.40mm, Thermal Pad 3.10x3.10mm, IPC Medium Density"
  oval 0.875x0.2 smd: 1(-3.437,2.6) 2(-3.437,2.2) 3(-3.437,1.8) 4(-3.437,1.4) 5(-3.437,1) 6(-3.437,0.6) 7(-3.437,0.2) 8(-3.437,-0.2) 9(-3.437,-0.6) 10(-3.437,-1) 11(-3.437,-1.4) 12(-3.437,-1.8) 13(-3.437,-2.2) 14(-3.437,-2.6) 29(3.437,-2.6) 30(3.437,-2.2) 31(3.437,-1.8) 32(3.437,-1.4) 33(3.437,-1) 34(3.437,-0.6) 35(3.437,-0.2) 36(3.437,0.2) 37(3.437,0.6) 38(3.437,1) 39(3.437,1.4) 40(3.437,1.8) 41(3.437,2.2) 42(3.437,2.6)
  oval 0.2x0.875 smd: 15(-2.6,-3.437) 16(-2.2,-3.437) 17(-1.8,-3.437) 18(-1.4,-3.437) 19(-1,-3.437) 20(-0.6,-3.437) 21(-0.2,-3.437) 22(0.2,-3.437) 23(0.6,-3.437) 24(1,-3.437) 25(1.4,-3.437) 26(1.8,-3.437) 27(2.2,-3.437) 28(2.6,-3.437) 43(2.6,3.437) 44(2.2,3.437) 45(1.8,3.437) 46(1.4,3.437) 47(1,3.437) 48(0.6,3.437) 49(0.2,3.437) 50(-0.2,3.437) 51(-0.6,3.437) 52(-1,3.437) 53(-1.4,3.437) 54(-1.8,3.437) 55(-2.2,3.437) 56(-2.6,3.437)
  rect 3.2x3.2 smd: 57(0,0)
  silkscreen extent -4.19,-3.65 3.65,3.65, body extent -3.52,-3.52 3.52,3.52, height 0.85
"Redcube M4 Term 85A" [mm]
  round 3.2 hole 1.85: 1(-4.435,-4.435) 1(-4.435,0) 1(-4.435,4.435) 1(0,-4.435) 1(0,4.435) 1(4.435,-4.435) 1(4.435,0) 1(4.435,4.435)
  round 3.2 hole 4.1 unplated: 8(0,0)
  body extent -5,-5 5,5, height 3
RESC1005X40X25ML05T05 [mm] "Chip Resistor, 2-Leads, Body 1.00x0.50mm, IPC Low Density"
  rect 0.65x0.65 smd: 1(-0.5,0) 2(0.5,0)
  body extent -0.53,-0.27 0.53,0.28, height 0.4
RESISTOR_0402 [mm] "Resistor 0402"
  rect 0.55x0.75 smd: 1(-0.475,0) 2(0.475,0)
  silkscreen extent -1.02,-0.64 1.02,0.64, body extent -0.5,-0.25 0.5,0.25, height 0.25
RESISTOR_0603 [mil] "Resistor 0603"
  rect 40x45 smd: 1(-33.5,0) 2(33.5,0)
  silkscreen extent -65,-35 65,35, body extent -31,-16 31,16, height 16
SMD_434123025826 [mm]
  rect 1.05x0.65 smd: A1(-2.075,1.075) A2(2.075,1.075) B1(-2.075,-1.075) B2(2.075,-1.075)
  silkscreen extent -2.1,-1.6 2.1,1.6, body extent -2.3,-1.6 2.3,1.6, height 2.5
"SOD-963   CST2C_TOS" [mil]
  rect 28x30 smd paste-14 mask+0: 1(-14.7,0)
  rect 20x30 smd paste-10 mask+0: 2(18.7,0)
  body extent -33,-16 33,16, height 20
SOIC-8 [mm] "SOIC, 8-Leads, Body 4.90x3.90mm, Pitch 1.27mm, IPC Medium Density"
  oval 1.45x0.6 smd: 1(-2.725,1.905) 2(-2.725,0.635) 3(-2.725,-0.635) 4(-2.725,-1.905) 5(2.725,-1.905) 6(2.725,-0.635) 7(2.725,0.635) 8(2.725,1.905)
  silkscreen extent -2.85,-2.5 1.6,2.88, body extent -3,-2.5 3,2.5, height 1.75
"SOIC-8 W25QxJV" [mm] "SOIC, 8-Leads, Body 5.28x5.28mm, Pitch 1.27mm, IPC Medium Density"
  oval 1.7x0.6 smd: 1(-3.55,1.905) 2(-3.55,0.635) 3(-3.55,-0.635) 4(-3.55,-1.905) 5(3.55,-1.905) 6(3.55,-0.635) 7(3.55,0.635) 8(3.55,1.905)
  silkscreen extent -3.68,-2.7 2.3,2.88, body extent -3.95,-2.62 3.95,2.62, height 1.95
SOIC-14 [mm] "SOIC, 14-Leads, Body 8.65x3.90mm, Pitch 1.27mm, IPC Medium Density"
  oval 1.45x0.6 smd: 1(-2.725,3.81) 2(-2.725,2.54) 3(-2.725,1.27) 4(-2.725,0) 5(-2.725,-1.27) 6(-2.725,-2.54) 7(-2.725,-3.81) 8(2.725,-3.81) 9(2.725,-2.54) 10(2.725,-1.27) 11(2.725,0) 12(2.725,1.27) 13(2.725,2.54) 14(2.725,3.81)
  silkscreen extent -2.85,-4.35 1.6,4.78, body extent -3,-4.4 3,4.4, height 1.7
"SOT 23-6L" [mm] "SOT23, 6-Leads, Body 2.95x2.80mm, Pitch 0.95mm, IPC Medium Density"
  rect 0.95x0.6 smd: 1(-1.35,0.95) 2(-1.35,0) 3(-1.35,-0.95) 4(1.35,-0.95) 5(1.35,0) 6(1.35,0.95)
  silkscreen extent -1.47,-1.55 0.5,1.93, body extent -1.4,-1.55 1.4,1.55, height 1.45
SOT-23-3 [mil]
  rect 22x50 smd paste+0 mask+4: 1(-37.5,-41) 2(37.5,-41) 3(0,41)
  silkscreen extent -65,-33 65,33, body extent -60,-52 60,52, height 44
SOT-223-4 [mm]
  rect 2.05x1 smd paste+0 mask+0.102: 1(-3.175,2.3) 2(-3.175,0) 3(-3.175,-2.3)
  rect 2.05x3.25 smd paste+0 mask+0.102: 4(3.175,0)
  silkscreen extent -1.96,-3.35 1.3,3.35, body extent -3.5,-3.25 3.5,3.25, height 1.68
TC2030-MCP [mil]
  round 31 smd: 1(50,-25) 2(50,25) 3(100,-25) 4(100,25) 5(150,-25) 6(150,25)
  round 34 hole 35 unplated: A(0,0) B(200,40) C(200,-40)
  round 92 hole 93 unplated: D(0,-100) E(125,-100) F(0,100) G(125,100)
  silkscreen extent -55,-155 225,155
TESTPOINT_1.2MM [mm]
  round 1.2 smd: TP(0,0)

## Part data
C1 C4: library part CAPACITOR_1uF_0603, "Cap 1uF 16V +/-10% / Ceramic 0603", Supplier Part Number 1=399-7847-1-ND, Tolerance="+/- 10%", Voltage=16V, Made By="Flip B", Supplier 1=Digi-Key
C1C C3C C3R C4C C5R C6R C7R C8R C9R C10R C12R C13R: library part CAPACITOR_0.1uF_0402, "Cap 100nF 25V +/-10% / Ceramic 0402", Supplier Part Number 1=478-7868-1-ND, Tolerance="+/- 10%", Voltage=25V, Made By="Robert Pafford", Supplier 1=Digi-Key
C1R C2R: library part CAPACITOR_0.000027uF_0402, "Cap 27pF 50V +/-5% / Ceramic 0402", Supplier Part Number 1=445-5589-1-ND, Tolerance="+/- 5%", Voltage=50V, Made By="Robert Pafford", Supplier 1=Digi-Key
C2 C5: library part CAPACITOR_0.1uF_0805, "Cap 100nF 50V +/-10% / Ceramic 0805", Supplier Part Number 1=38AH3645, Tolerance="+/- 10%", Voltage=50V, Made By="Robert Pafford", Supplier 1=Newark
C2C: library part CAPACITOR_0.0047uF_0402, "4700 pF +/-10% 25V Ceramic Capacitor X7R 0402", Supplier Part Number 1=478-6195-1-ND, Tolerance="+/- 10%", Voltage=25V, Made By="Robert Pafford", Supplier 1=Digi-Key
C3 C6: library part CAPACITOR_0.022uF_0402, "Cap 22nF 25V +/-10% / Ceramic 0402", Supplier Part Number 1=445-1261-1-ND, Tolerance="+/- 10%", Voltage=25V, Made By="Robert Pafford", Supplier 1=Digi-Key
C4R C5C C11R: library part CAPACITOR_1uF_0402, "Cap 1uF 16V +/-10% / Ceramic 0402", Supplier Part Number 1=478-0402YD105KAT4ADKR-ND, Tolerance="+/- 10%", Voltage=16V, Made By="Robert Pafford", Supplier 1=Digi-Key
C7_1 C7_2 C7_3 C7_5: library part CAPACITOR_4.7uF_0603, "Cap 4.7uF 6.3V +/-10% / Ceramic 0603", Supplier Part Number 1=1276-2087-1-ND, Tolerance="+/- 10%", Voltage=6.3V, Made By="Robert Pafford", Supplier 1=Digi-Key
C8_1 C8_2 C8_3 C8_5 C11_1 C11_2 C11_3 C11_5: library part CMP-2000-06038-3, "Multilayer Ceramic Capacitors 22μF ±20% 35V X5R SMD 0805", Case Code (Imperial)=0805, Case Code (Metric)=2012, Dielectric=X5R, Dielectric Material=Ceramic, Max Operating Temperature=85°C, Min Operating Temperature=-55°C, Package Quantity=2000, Tolerance=20%, Voltage Rating=35V, Capacitance=22uF, Case/Package=0805, Height=1.25mm, Lead Free="Lead Free", Length=0.079inch, Mount="Surface Mount", Packaging="Tape and Reel", REACH SVHC="No SVHC", RoHS Compliant=Yes, Series=C, Termination=SMD/SMT, Thickness=0.057inch, Voltage Rating (DC)=35V, Weight=0.000194oz, Width=0.049inch
C9_1 C9_2 C9_3 C9_5: library part CAPACITOR_0.1uF_0603_1, "Cap 100nF 6.3V +/-10% / Ceramic 0603", Supplier Part Number 1=399-15351-1-ND, Tolerance="+/- 10%", Voltage=6.3V, ComponentLink1Description=Datsheet, ComponentLink1URL=https://www.mouser.com/datasheet/2/212/KEM_C1002_X7R_SMD-1102033.pdf, Made By="Flip B", Supplier 1=Digi-Key
C10_1 C10_2 C10_3 C10_5: library part "CAP CERM 4.7UF 20% 35V", "Chip Multilayer Ceramic Capacitors for General Purpose, 0603, 4.7uF, X5R, 15%, 20%, 35V", Case Code (Imperial)=0603, Case Code (Metric)=1608, Dielectric=X5R, Max Operating Temperature=85°C, Min Operating Temperature=-55°C, Package Quantity=4000, Resistor Type=Ceramic, Supplier Part Number 1=GRM188R6YA475ME15D, Tolerance=20%, Voltage Rating=35V, Capacitance=4.7uF, Case/Package=0603, Height=0.8mm, Length=0.063inch, Mount="Surface Mount", Packaging="Tape and Reel", Supplier 1="Arrow Electronics", Termination=SMD/SMT, Thickness=0.039inch, Voltage Rating (DC)=35V, Weight=0.000222oz, Width=0.8mm
C12_1 C12_2 C12_3 C12_5 C15_1 C15_2 C15_3 C15_5 C17_1 C17_2 C17_3 C17_5 C19_1 C19_2 C19_3 C19_5: library part CAPACITOR_0.1uF_0603_25V, "Cap 100nF 25V +/-10% / Ceramic 0603", Supplier Part Number 1=1276-1006-1-ND, Tolerance="+/- 10%", Voltage=6.3V, ComponentLink1Description=Datsheet, ComponentLink1URL=https://www.mouser.com/datasheet/2/212/KEM_C1002_X7R_SMD-1102033.pdf, Made By="Flip B", Supplier 1=Digikey
C13 C14: library part CAPACITOR_10uF_1206_Tantalum_1, "Cap 10uF 16V +/-20% / Tantalum 1206", Supplier Part Number 1=26AC4143, Tolerance="+/- 10%", Value (uF)="10 uF", Voltage=16V, ComponentLink1Description=Digikey, ComponentLink1URL=https://www.digikey.com/en/products/detail/kyocera-avx/F981A106MMA/4004990, Made By="Dylan T", Supplier 1=Newark
C16_1 C16_2 C16_3 C16_5 C18_1 C18_2 C18_3 C18_5: library part CAPACITOR_1uF_0603_25V, "Cap 1uF 25V +/-10% / Ceramic 0603", Supplier Part Number 1=1276-1102-1-ND, Tolerance="+/- 10%", Voltage=16V, Made By="Flip B", Supplier 1=Digikey
D1_1 D1_2 D1_3 D1_5 D2_1 D2_2 D2_3 D2_5: library part SCHOTTKY_40V_1.5A, "DIODE SCHOTTKY 40V 1.5A CST2C", Mfr_Name="Toshiba Electronic Devices & Storage Corp.", Supplier Part Number 1=CCS15S40L3FCT-ND, Copyright="Copyright (C) 2023 Ultra Librarian. All rights reserved.", Manufacturer_Part_Number=CCS15S40,L3F, RefDes=RefDes, Supplier 1=Digi-Key, Type=DEV
D1C: library part LED_RGB_4SMD, "LED RGB CLEAR 4SMD", Blue Forward Current=5mA, Blue Forward Voltage=2.8V, Color=RGB, Package=4-SMD, Red Forward Voltage=1.8V, Supplier Part Number 1=1080-1552-1-ND, ComponentLink1Description=Datasheet, ComponentLink1URL=https://everlightamericas.com/index.php?controller=attachment&id_attachment=3220, Green Forward Current=5mA, Green Forward Voltage=2.8V, Made By="Robert Pafford", Red Forward Current=5mA, Supplier 1=Digi-Key
D5: library part RCLAMP0504S.TCT, "25V Clamp 6A (8/20µs) Ipp Tvs Diode Surface Mount SOT-23-6", Breakdown Voltage (Min)=6V, Clamping Voltage (Max)=25V, Reverse Standoff Voltage (Typ)=5V, Supplier Part Number 1=RCLAMP0504SCT-ND, Made By="Robert Pafford", Supplier 1=Digi-Key
J1_1 J1_5 J10_1 J10_5: library part CMP-00257-52824861-1, "172448-0004 Conn Power HDR 4 POS 4.2mm Solder RA Thru-Hole 4 Terminal 1 Port Mini-Fit Jr™ Frame", Color=Black, Current Rating=13A, Manufacturer Lifecycle Status=ACTIVE, Max Operating Temperature=105°C, Min Operating Temperature=-40°C, Voltage Rating=600V, Connector Type="Male Pin", Contact Material=Tin, Contact Plating=Tin, Country of Origin=US, Fastening Type=Ramp, Glow Wire Compliant=Compliant, Height=12.03mm, Lifecycle Status=Production, Mount="Through Hole", NexarPartId=52824861, Number of Circuits=4, Number of Contacts=4, Number of Positions=4, Number of Rows=2, Orientation="Right Angle", Pitch=4.191mm, RoHS=Compliant, Row Spacing=4.191mm, Termination=Solder
J1R: library part TC2030_SWD, "TagConnect TC2030 ARM SWD 6-pin"
J2 J4: library part "CONN_MOLEX_MINIFIT JR_6POS_R/A", "Molex Minifit Jr. 5569  / 6 Pos R/A Natural", Color=Natural, Current Per Pin=13A, Manufacturer=Molex, Supplier Part Number 1=WM1353-ND, ComponentLink1Description=Datasheet, ComponentLink1URL=https://www.molex.com/pdm_docs/ps/PS-5556-001.pdf, Configuration="Right Angle", Created By="Flip B", Number of Positions=8, Pitch=4.2mm, Series="Minifit Jr 5569", Supplier 1=Digi-Key
J3: library part CONN_MICROUSB, "Amphenol Micro USB-B / USB2.0 5 Pin Right Angle SMD", Color=Silver, Current Per Pin=1.8A, Manufacturer=Amphenol, Supplier Part Number 1=609-4613-1-ND, ComponentLink1Description=Datasheet, ComponentLink1URL=https://cdn.amphenol-icc.com/media/wysiwyg/files/documentation/datasheet/inputoutput/io_usb_micro.pdf?__cf_chl_jschl_tk__=05693735e19256298f6ef6ca2bb2e65c376a4f56-1625503833-0-Abitsb0-ufjOXJYs_S3J3r2iTn-nObalbmXUksF1VvO_h_WEmRdMlUD1I8-hmWSEVWzY1pirKnrPZWfgY3851qyBZe5ZvnNQePLGIzUgdEIQBVUyW36RsbYpDLEWxJ4horD-5gChFgobLYqwmG5aHl0E8lIn_twwPPrOxilK2gP0q9t_CNOs_u5fMqXvXUrlsOv8tIE2NRlu6NVP8qtkL2GjhlkeTUbDMF8WvvpPDTFOgvZ4Y16Ej8F8AhWos88mo5B1HssXozw0XrkJQIqERITUu6rqloz9kf4ZzhBHtDAt-IkiAFY_Ds9SW8FYKKTtINJVpHZQ6Gyu1FFM4Dc9MO0maE8_mmNcwlxqyRoRk_MPWW8VyByXWM5RSp52jteRKw7FeI9WIYvCbPAOy0Eyib-aseIQsnGbglBcUY6_2xp8GYaJM38H3dNvBPsSOfJBPndKedwKHllxjkucXn6xsN0sDXkpGN-cu8_2bDTJ0g-uUucKSCooYX-ApSDNGpkA_p9zv1SOAD8c0zaZVmtiBsN75QpVz2rzq9_BFxOywPvR, Configuration="Right Angle", Created By="Flip B", Number of Positions=5, Pitch=0.65mm, Series=10118192, Supplier 1=Digi-Key
J5: library part "CONN_MOLEX_MINIFIT JR_2POS_R/A", "Molex Minifit Jr. 5569  / 2 Pos R/A Natural", Color=Natural, Current Per Pin=13A, Manufacturer=Molex, Supplier Part Number 1=WM1351-ND, ComponentLink1Description=Datasheet, ComponentLink1URL=https://www.molex.com/pdm_docs/sd/026013115_sd.pdf, Configuration="Right Angle", Created By="Robert P", Number of Positions=2, Pitch=4.2mm, Series="Minifit Jr 5569", Supplier 1=Digi-Key
J6 J7 J8 J9: library part CMP-17439-000041-1, "CONN HEADER VERT 3POS 1.5MM", Color=Natural, Contact Resistance=30mR, Current Rating=1A, Flammability Rating="UL94 V-0", Housing Color=Beige, Insulation Resistance=500MR, Max Operating Temperature=85°C, Max Voltage Rating (AC)=50V, Min Operating Temperature=-25°C, Body Plating=Tin, Connector Type="Male Pin", Contact Material=Copper, Contact Mating Length=0.094inch, Contact Plating=Tin, Contact Type="Male Pin", Depth=3.5mm, Fastening Type=Detent, Gender=Male, Housing Material=Polyamide, Lead Free="Lead Free", Lead Pitch=1.5mm, Length=6mm, Material=Nylon, Max Current Rating=1A, Mount="Through Hole", Number of Contacts=3, Number of Positions=3, Number of Rows=1, Orientation=Straight, Packaging=Bulk, Panel Thickness=3.5mm, Pitch=1.5mm, REACH SVHC="No SVHC", Series=ZH, Termination=Solder, Voltage Rating=50V, Voltage Rating (AC)=50V, Voltage Rating (DC)=50V
J10: Current Rating="85 A", Created By="Nahtan Ayer", Screw Size=M4
L1_1 L1_2 L1_3 L1_5 L2_1 L2_2 L2_3 L2_5: library part INDUCTOR_SRR1280-221K, "220 µH Shielded Drum Core, Wirewound Inductor 1.6 A 400mOhm Max Nonstandard", Mfr_Name="Bourns Electronics", Supplier Part Number 1=SRR1280-221KLCT-ND, Copyright="Copyright (C) 2023 Ultra Librarian. All rights reserved.", Manufacturer_Part_Number=SRR1280-221K, RefDes=RefDes, Supplier 1=Digi-Key, Type=DEV
Q1: "P-Channel 10.8A (Ta), 50A (Tc) 2.4W (Ta), 69W (Tc) Surface Mount D-PAK (TO-252AA)", Amp Rating="10.8 A", Package="D-PAK (TO-252AA)", Power Dissipation="2.4W (Ta), 69W (Tc)", Supplier Part Number 1=FDD4141CT-ND, Created By="Dylan T", FET Type="P-Channel, Power", Manufacturer_Part_Number=FDD4141, Rds (on)="12.3mOhm @ 12.7A, 10V", SourceLibrary=ON_Semiconductor_2020-01-13, Supplier 1=Digi-Key, Vdss="40 V", Vendor="ON Semiconductor", Vgs (Max)=±20V, Vgs (th)="3V @ 250µA"
Q2: "N-Channel 20 V 7.3A (Ta) 610mW (Ta), 8.3W (Tc) Surface Mount TO-236AB", Amp Rating="7.3 A", Package=SOT23-3L, Power Dissipation="610mW (Ta), 8.3W (Tc)", Supplier Part Number 1=771-PMV13XNEAR, Created By="Dylan T", FET Type=N-Channel, Manufacturer _Part_Number=PMV13XNEAR, Rds (on)="15mOhm @ 7.3A, 8V", SourceLibrary=ON_Semiconductor_2020-01-13, Supplier 1=Mouser, Vdss="20 V", Vendor="Nexperia USA Inc.", Vgs (Max)="+/- 12 V", Vgs (th)="1.3V @ 250uA"
Q3: library part TSM500P02CX, "P-Channel 20 V 4.7A (Tc) 1.56W (Tc) Surface Mount SOT-23", Amp Rating="4.7 A", Package="TO-236-3, SC-59, SOT-23-3", Power Dissipation="1.56W (Tc)", Supplier Part Number 1=TSM500P02CXRFGCT-ND, Created By="Robert Pafford", FET Type=P-Channel, Manufacturer_Part_Number=TSM500P02CX, Rds (on)="50mOhm @ 3A, 4.5V", Supplier 1=Digi-Key, Vdss="20 V", Vendor="Taiwan Semiconductor Corporation", Vgs (Max)=±10V, Vgs (th)="800mV @ 250µA"
R1 R3: library part RESISTOR_1K_0603, "RES 1k OHM 5% 1/8W 0603", Digikey Part Numer=CR0603-JW-104ELFTR-ND, Supplier Part Number 1=2019-RK73B1JTTD102JCT-ND, Tolerance="+/- 5%", Value  (Ohms)=1K, ComponentLink1Description=Datasheet, ComponentLink1URL=https://www.bourns.com/docs/product-datasheets/CRxxxxx.pdf, Made By="Robert Pafford", Supplier=Digikey, Supplier 1=Digi-Key, Wattage=1/8W
R1C R4_1 R4_2 R4_3 R4_5 R4C R4R R5R R6C: library part RESISTOR_10K_0402, "RES 10k OHM 1% 1/16W 0402", Digikey Part Numer=CR0603-JW-104ELFTR-ND, Supplier Part Number 1=YAG3436CT-ND, Tolerance="+/- 1%", Value  (Ohms)=10K, Made By="Robert Pafford", Supplier=Digikey, Supplier 1=Digi-Key, Wattage=1/16W
R1R R6R R7R R8: library part RESISTOR_1K_0402, "RES 1k OHM 1% 1/16W 0402", Digikey Part Numer=CR0603-JW-104ELFTR-ND, Supplier Part Number 1=13-AC0402FR-131KLCT-ND, Tolerance="+/- 1%", Value  (Ohms)=1K, Made By="Robert Pafford", Supplier=Digikey, Supplier 1=Digi-Key, Wattage=1/16W
R2C R3C: library part RESISTOR_60.4_0402, "RES 60.4 OHM 1% 1/16W 0402", Digikey Part Numer=CR0603-JW-104ELFTR-ND, Supplier Part Number 1=13-AC0402FR-0760R4LCT-ND, Tolerance="+/- 1%", Value  (Ohms)=60.4, Made By="Robert Pafford", Supplier=Digikey, Supplier 1=Digi-Key, Wattage=1/16W
R2R R3R: library part RESISTOR_27_0402, "RES 27 OHM 1% 1/16W 0402", Digikey Part Numer=CR0603-JW-104ELFTR-ND, Supplier Part Number 1=YAG5278DKR-ND, Tolerance="+/- 1%", Value  (Ohms)=27, Made By="Robert Pafford", Supplier=Digikey, Supplier 1=Digi-Key, Wattage=1/16W
R5_1 R5_2 R5_3 R5_5 R6_1 R6_2 R6_3 R6_5: library part RESISTOR_27_0603, "RES 27 OHM 5% 1/8W 0603", Digikey Part Numer=CR0603-JW-104ELFTR-ND, Supplier Part Number 1=2019-RK73B1JTTD270JCT-ND, Tolerance="+/- 5%", Value  (Ohms)=27, ComponentLink1Description=Datasheet, ComponentLink1URL=https://www.bourns.com/docs/product-datasheets/CRxxxxx.pdf, Made By="Robert Pafford", Supplier=Digikey, Supplier 1=Digi-Key, Wattage=1/8W
R5C: library part RESISTOR_604_0402, "RES 604 OHM 1% 1/16W 0402", Digikey Part Numer=CR0603-JW-104ELFTR-ND, Supplier Part Number 1=13-AC0402FR-07604RLCT-ND, Tolerance="+/- 1%", Value  (Ohms)=604, Made By="Robert Pafford", Supplier=Digikey, Supplier 1=Digi-Key, Wattage=1/16W
R7C R8C: library part RESISTOR_200_0402, "RES 200 OHM 1% 1/16W 0402", Digikey Part Numer=CR0603-JW-104ELFTR-ND, Supplier Part Number 1=YAG3453CT-ND, Tolerance="+/- 1%", Value  (Ohms)=200, Made By="Robert Pafford", Supplier=Digikey, Supplier 1=Digi-Key, Wattage=1/16W
R9: library part CMP-2002-00501-1, "RES SMD 27K OHM 5% 1/10W 0402ERJ-2GEJ273X", Manufacturer=Panasonic, Part Number=ERJ-2GEJ273X
SW1C: library part CAS-220TA_CAN_TERM, "GOLD SWITCH FLUSH SLIDE DPDT 100MA 6V", Current Rating="100 mA", Supplier Part Number 1=CAS220JCT-ND, Voltage Rating=6VDC, Contact Finish=Gold, Made By="Robert Pafford", Supplier 1=Digi-Key, Switch Function=DPDT
SW1R SW2R: library part "Tactile Switch SMD", "WS-TASV J-Bend SMT Tact Switch, SPST-NO, 16VDC, 50mA, 260g", Manufacturer="Wurth Elektronik", Operating Temperature Max=85°C, Operating Temperature Min=-40°C, Rated Current=50mA, Rated Voltage=16VDC, Category="Tact Switches", Circuit=SPST-NO, ComponentLink1Description="Website Link", ComponentLink1URL=https://www.we-online.com/redexpert/article/434123025826?ad, ComponentLink2Description="Datasheet Link", ComponentLink2URL=https://www.we-online.com/redexpert/spec/434123025826?ad, Contact Material="Stainless Steel", Contact Plating=Silver, Height=2.5mm, Length=4.2mm, Manufacturer Part Number=434123025826, Match Code=WS-TASV, Mount="Surface Mount", Operation Force=260g, Packaging="Tape and Reel", Terminal Material="Copper Alloy", Terminal Plating=Silver, Washable=No, Width=3.2mm
TP1_1 TP1_2 TP1_3 TP1_5 TP2_1 TP2_2 TP2_3 TP2_5 TPmiso TPmosi TPpwm TPsck TPsck1: library part TESTPOINT, Made By="Robert Pafford"
U1: library part CMP-1575-00036-4, "High Speed CMOS 8-Channel Analog Multiplexer/Demultiplexer, D0016A, LARGE T&R", Generic Part Number=CD74HC4051, Manufacturer="Texas Instruments", Operating Temperature Range(C)="-55 to 125", Rating=Catalog, Bandwidth(Max)(MHz)=180, Code_JEDEC="MS-012 variation AC", Configuration="1 X 1：8 MUX", Crosstalk=Yes, DatasheetVersion=SCHS122J, Output Type=CMOS, PackageReference=D0016A, PackageVersion=http://www.ti.com/lit/ml/mpds178g/mpds178g.pdf, Ron(Max)(Ohms)=130, Ron(Typ)(Ohms)=45, VCC(Max)(V)=6, VCC(Min)(V)=2
U1C: "CANbus Controller CAN 2.0 SPI Interface 14-SOIC", Made By="Robert Pafford", Max FD Rate="8 Mbps"
U1R: "Raspberry Pi RP2040", Crystal Frequency="12 MHz", Input Voltage=3.3V, Available Busses="SPI, I2C, PWM, USB", ComponentLink1Description=DigiKey, ComponentLink2Description=Datasheet, ComponentLink2URL=https://datasheets.raspberrypi.org/rp2040/rp2040-datasheet.pdf, Made By="Robert Pafford", Number of GPIOs=29
U2_1 U2_2 U2_3 U2_5: "IC LED DRVR RGLTR PWM 1.5A 40QFN", Mfr_Name=STMicroelectronics, Supplier Part Number 1=497-18126-1-ND, Copyright="Copyright (C) 2023 Ultra Librarian. All rights reserved.", Manufacturer_Part_Number=L99LD20Q6TR, RefDes=RefDes, Supplier 1=Digi-Key, Type=DEV
U2C: library part TJA1442AT, "CAN Interface IC High-Speed CAN Transceiver with Standby Mode", Supplier Part Number 1=771-TJA1442AT/0Z, Made By="Robert Pafford", Max Data Rate=5Mbps, Supplier 1=Mouser
U2R: "IC FLASH 128MBIT SPI/QUAD 8SOIC", Supplier Part Number 1=W25Q128JVSIQ-ND, Made By="Robert Pafford", Size=128M, Supplier 1=Digi-Key
U3: "IC REG LIN 3.3V 800MA SOT223-4", Manufacturer="Texas Instruments", Package=SOT-223-4, PartNumber=LM1117IMP-3.3/NOPB, Supplier Part Number 1=LM1117IMPX-3.3/NOPBCT-ND, Amp Out=800mA, Created By="Dylan T", Supplier 1=Digi-Key, Vin (Max)=15V, Vout (Min/Fixed)=3.3V
Y1R: library part CRYSTAL_12MHz_SMD_SMALL, "12 MHz ±20ppm Crystal 18pF 100 Ohms 4-SMD, No Lead (3.2x2.5mm)", Frequency="12 MHz", Load Capacitance=18pF, Supplier Part Number 1=2151-RH100-12.000-18-2030-EXT-TRCT-ND, ESR="100 Ohms", Made By="Robert Pafford", Supplier 1=Digi-Key

## Free pads (board coordinates)
  round 0 hole 165 unplated: 1(250,250) 1(250,4750) 1(2648.66,4750) 1(2649.88,250)
  round 118.11 hole 70.87: 2(1990,1935) 2(2515,2200) 2(2590,1850) 2(2590,1970) 2(2625,720) 2(2710,1850) 2(2710,1970) 2(2799.4,3605) 2(2825,895)

## Via types
v1: diameter 22, hole 10, Top Layer to Bottom Layer, tented both sides, 231 vias
v2: diameter 22, hole 10, Top Layer to Bottom Layer, 60 vias
v3: diameter 27.56, hole 11.81, Top Layer to Bottom Layer, tented both sides, 33 vias
v4: diameter 31.5, hole 15.75, Top Layer to Bottom Layer, tented both sides, 27 vias
v5: diameter 40, hole 28, Top Layer to Bottom Layer, tented both sides, 6 vias
v6: diameter 28, hole 16, Top Layer to Bottom Layer, tented both sides, 4 vias
v7: diameter 45.28, hole 27.56, Top Layer to Bottom Layer, tented both sides, 4 vias
v8: diameter 40, hole 20, Top Layer to Bottom Layer, tented both sides, 3 vias

## Nets (pads, with @x,y where several pads share a name; then routed paths per layer and width w, separated by ;. In a path a pad name is that pad's centre, name@x,y a point inside that pad or via, vN(x,y) a via of type N, cw(c..) or ccw(c..) an arc to the next point about the centre after c; other vN are vias at no path point)
1v1_RP2040: C11R.1 C12R.1 C13R.1 U1R.23 U1R.45 U1R.50 | length 605.1
  Top Layer w15.75: C11R.1@700,3197.08 701.94,3195.14 701.94,3171.34 717.07,3156.21 v3(720,3156.21) ; C12R.1@752.76,2926.18 752.76,2948.41 732.33,2968.84 v3(729.13,2968.84) 790,3029.71 790,3064.58 800,3074.58 v3(800,3153.15) C13R.1@845.87,3153.15
  Bottom Layer w7.87: U1R.45@721.26,3201.87 721.26,3153.15 v3(800,3153.15) U1R.50@800,3201.87 ; v3(729.13,2968.84) 732.9,2965.07 750.38,2965.07 765.63,2949.82 765.63,2947.36 768.5,2944.49 U1R.23@768.5,2931.2
3V3: C1C.1 C3C.1 C3R.1 C4R.1 C5C.1 C5R.1 C6R.1 C7R.1 C8R.1 C9_1.1 C9_2.1 C9_3.1 C9_5.1 C9R.1 C10R.1 C14.1 D1C.4 J1R.2 Q3.2 R1C.1 R4_1.1 R4_2.1 R4_3.1 R4_5.1 R4C.1 R4R.1 R5R.1 R8.1 U1C.14 U1R.1 U1R.10 U1R.22 U1R.33 U1R.42 U1R.43 U1R.44 U1R.48 U1R.49 U2_1.7 U2_2.7 U2_3.7 U2_5.7 U2C.5 U2R.8 U3.2 U3.4 | length 4807.2
  Top Layer w7.87: Q3.2@461,4167.5 497.5,4167.5 534.21,4130.79 534.21,3364.31 593.51,3305 v7(593.51,3294.88) ; R8.1@465,4231.3 465,4171.5 Q3.2@471,4171.5
  Top Layer w10: v2(860,1745) v2(860,1830) ; U2_5.7@865.47,1446 865.47,1547.22 870,1551.75 v2(870,1555) ; v2(1260,2865) R4_2.1@1396.3,2865 R4_2.1@1397.3,2865 ; v2(1400,1505) v2(1490,1505) ; v2(1430,2695) 1460,2695 C9_2.1@1465,2690 1465,2685 1479.54,2670.47 U2_2.7@1569,2670.47 ; v2(1605,3880) 1608.25,3880 1613.71,3885.47 U2_1.7@1649,3885.47 ; v2(1780,1305) 1780.46,1305.46 U2_3.7@1864,1305.46
  Top Layer w15.75: v3(960.65,3205) C7R.1@997.87,3205 C7R.1@997.99,3205
  Top Layer w16: v3@993.56,3025 1026.44,3025
  Bottom Layer w7.87: C10R.1@587.4,3175.4 638.89,3175.4 643.5,3170.78 643.5,3168.9 U1R.42@656.79,3168.9 670.08,3168.9 U1R.43@689.76,3188.58 ; C4R.1@683.27,3255.51 C4R.1@683.27,3254.73 ; C4R.1@683.27,3254.73 683.27,3221.65 689.76,3215.16 U1R.43@689.76,3201.87 U1R.44@705.51,3201.87 705.51,3233.27 691.14,3247.64 690.35,3247.64 C4R.1@683.27,3254.73
  Bottom Layer w10: v2(860,1745) 860,1630.5 C9_5.1@895.25,1595.25 C9_5.1@895.68,1594.82 ; v2(860,1830) 1085,2055 1085,2150 ; v2(870,1555) 895.68,1580.68 C9_5.1@895.68,1594.82 ; R4_5.1@1026.77,1507.27 1026.67,1507.37 983.14,1507.37 C9_5.1@895.68,1594.82 ; R4_5.1@1035,1508.7 1038.7,1505 v2(1400,1505) ; 1055,3795 1091.3,3795 1245,3948.7 1265.24,3948.7 1271.06,3954.53 1275,3954.53 1279.53,3950 1500,3950 1560,3890 1565,3890 C9_1.1@1575,3880 ; 1145,2870 1150,2865 v2(1260,2865) v2(1430,2695) ; v2(1490,1505) 1618.55,1505 R4_3.1@1681.78,1441.78 1681.78,1433.54 1690,1425.31 1690,1340 1710,1320 1710,1315 1720,1305 C9_3.1@1725,1305 v2(1780,1305) 1777.7,1302.7 v2@1773.92,1302.7 ; C9_1.1@1575,3875 1580,3880 v2(1605,3880)
  Bottom Layer w20: C1C.1@294.69,2562.3 C1C.1@294.69,2562.6 295.18,2563.09 295.18,2643.8 U1C.14@295.67,2644.29 295.67,2660.45 339.42,2704.2 v8(340,2704.2)
  other v3: 812.42,2969.86 697.64,2995.67 985,3025 790,3239.2
  other v4: 666.14,2885.43 532.36,2998.3
  other v7: 847.24,3487.99
  other v8: 210,2704.2
_+5V: C1.1 C2.1 C3.1 C4C.1 C13.1 D5.5 J2.5 J4.5 Q1.2 R1.1 U1.16 U2C.3 U3.3 | length 4840.9
  Top Layer w10: v2(105,3030) U1.16@105,3095
  Top Layer w15.75: v8(165,2464.2) 168.91,2468.11 363.73,2468.11 387.36,2444.49 v3(390.55,2444.49)
  Top Layer w20: v5(355,3220) 355,3309.2 335,3329.2 335,3459.2 v5(395,3519.2)
  Bottom Layer w8: U3.3@1111.35,3900 U3.3@1111.35,3920.67
  Bottom Layer w10: v2(105,3030) 165,3030
  Bottom Layer w15.75: C4C.1@368.31,2475.99 368.31,2475.2 v3@386.78,2456.72 ; U2C.3@384.06,2386.42 387.07,2389.43 387.07,2441.01 v3(390.55,2444.49)
  Bottom Layer w20: v8(165,2464.2) 165,3030 v5(355,3220) ; v5(395,3519.2) 910.8,4035 1111.35,4035 C13.1@1116.48,4035 ; v5@395.36,3518.85 445,3469.2 D5.5@445,3407.35
  Bottom Layer w40: J2.5@1044.65,4201.06 1059.59,4186.12 1059.59,4140.41 1109.82,4090.18 1109.82,4041.66 C13.1@1116.48,4035 ; 1092.95,4114.13 1572.72,4114.13 J4.5@1659.65,4201.06 1746.57,4287.99 2266.45,4287.99 2267.94,4286.5 2734.86,4286.5 2781.86,4333.5 2783.5,4333.5 2795,4345 Q1.2@2795,4372.5 ; U3.3@1111.35,3920.67 C13.1@1111.35,4035
_CANH: J2.4 J4.4 SW1C.4 U2C.7 | length 4063.3
  Top Layer w7.87: J2.4@879.29,4201.06 885.02,4206.79 950.16,4206.79 1028.36,4285 1410.35,4285 J4.4@1494.29,4201.06
  Bottom Layer w7.87: U2C.7@334.06,2171.85 334.06,2150.95 510.63,1974.37 510.63,1961.46 SW1C.4@526.38,1945.71 ; SW1C.4@526.38,1942.52 526.38,1930.71 284.29,1930.71 48.95,2166.05 48.95,3553.95 60.94,3565.94 98.48,3603.48 273.48,3603.48 871.06,4201.06 J2.4@879.29,4201.06
_CANL: J2.1 J4.1 SW1C.1 U2C.6 | length 4349.5
  Top Layer w8: J2.1@879.29,4417.6 961.89,4335 1411.69,4335 J4.1@1494.29,4417.6
  Bottom Layer w8: U2C.6@384.06,2171.85 384.06,2155.12 462.8,2076.38 526.38,2076.38 526.38,2064.57 557.72,2033.23 560.06,2030.88 560.06,1909.69 555.38,1905 290,1905 45,2150 37.47,2157.53 37.47,3562.78 90,3615.31 94.69,3620 190,3620 879.29,4309.29 J2.1@879.29,4417.6
_Fan_PWR: J1_1.4 J1_5.4 J6.2 J7.2 J8.2 J9.2 J10_1.4 J10_5.4 Q1.3 | length 7510.2